# Altium PCB CH32H417QEU-R1.PcbDoc (part 1 of 6)
Units mil, origin at the board's own origin, x right, y up, seen from the top; angles counter-clockwise.
Board outline 4921.26 x 3346.46 mil, 4 copper layers (Top Layer, Layer 1, Layer 2, Bottom Layer), stack 23.756 mil thick; 271 components, 257 nets, 1065 pads, 927 vias.
Unrouted connection lines stored in the file: 149.
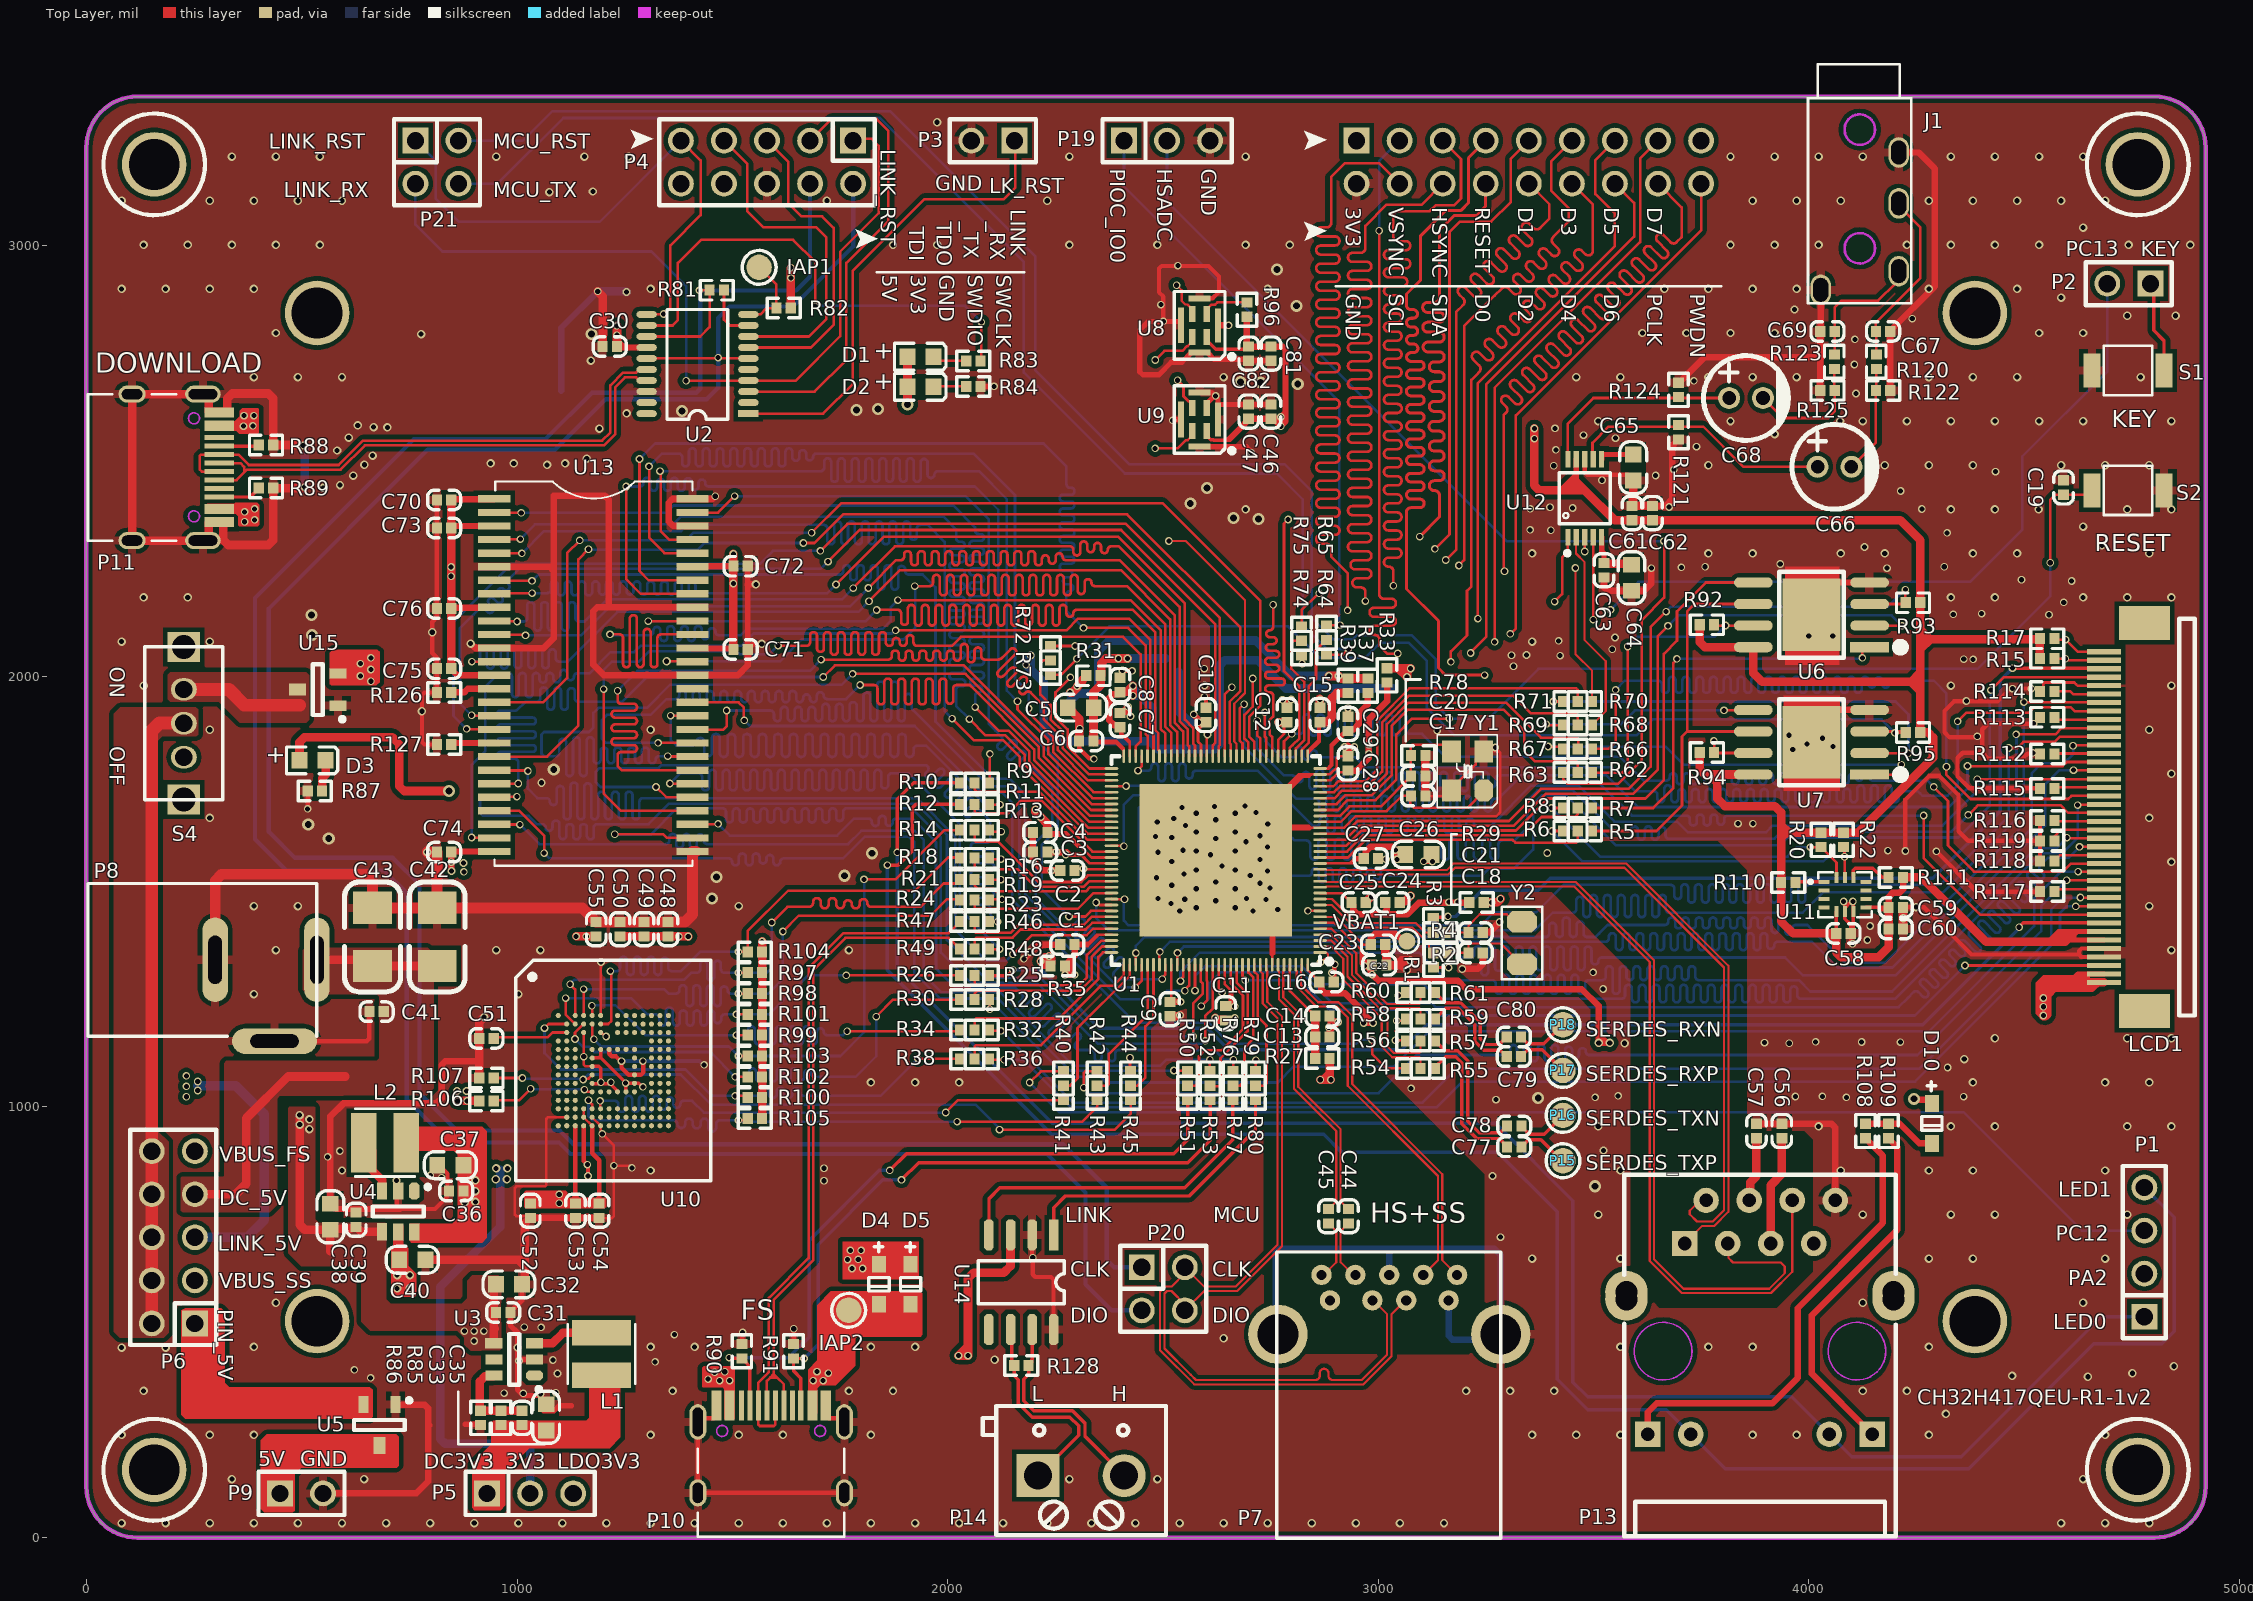
[diagram p0: Top Layer view]
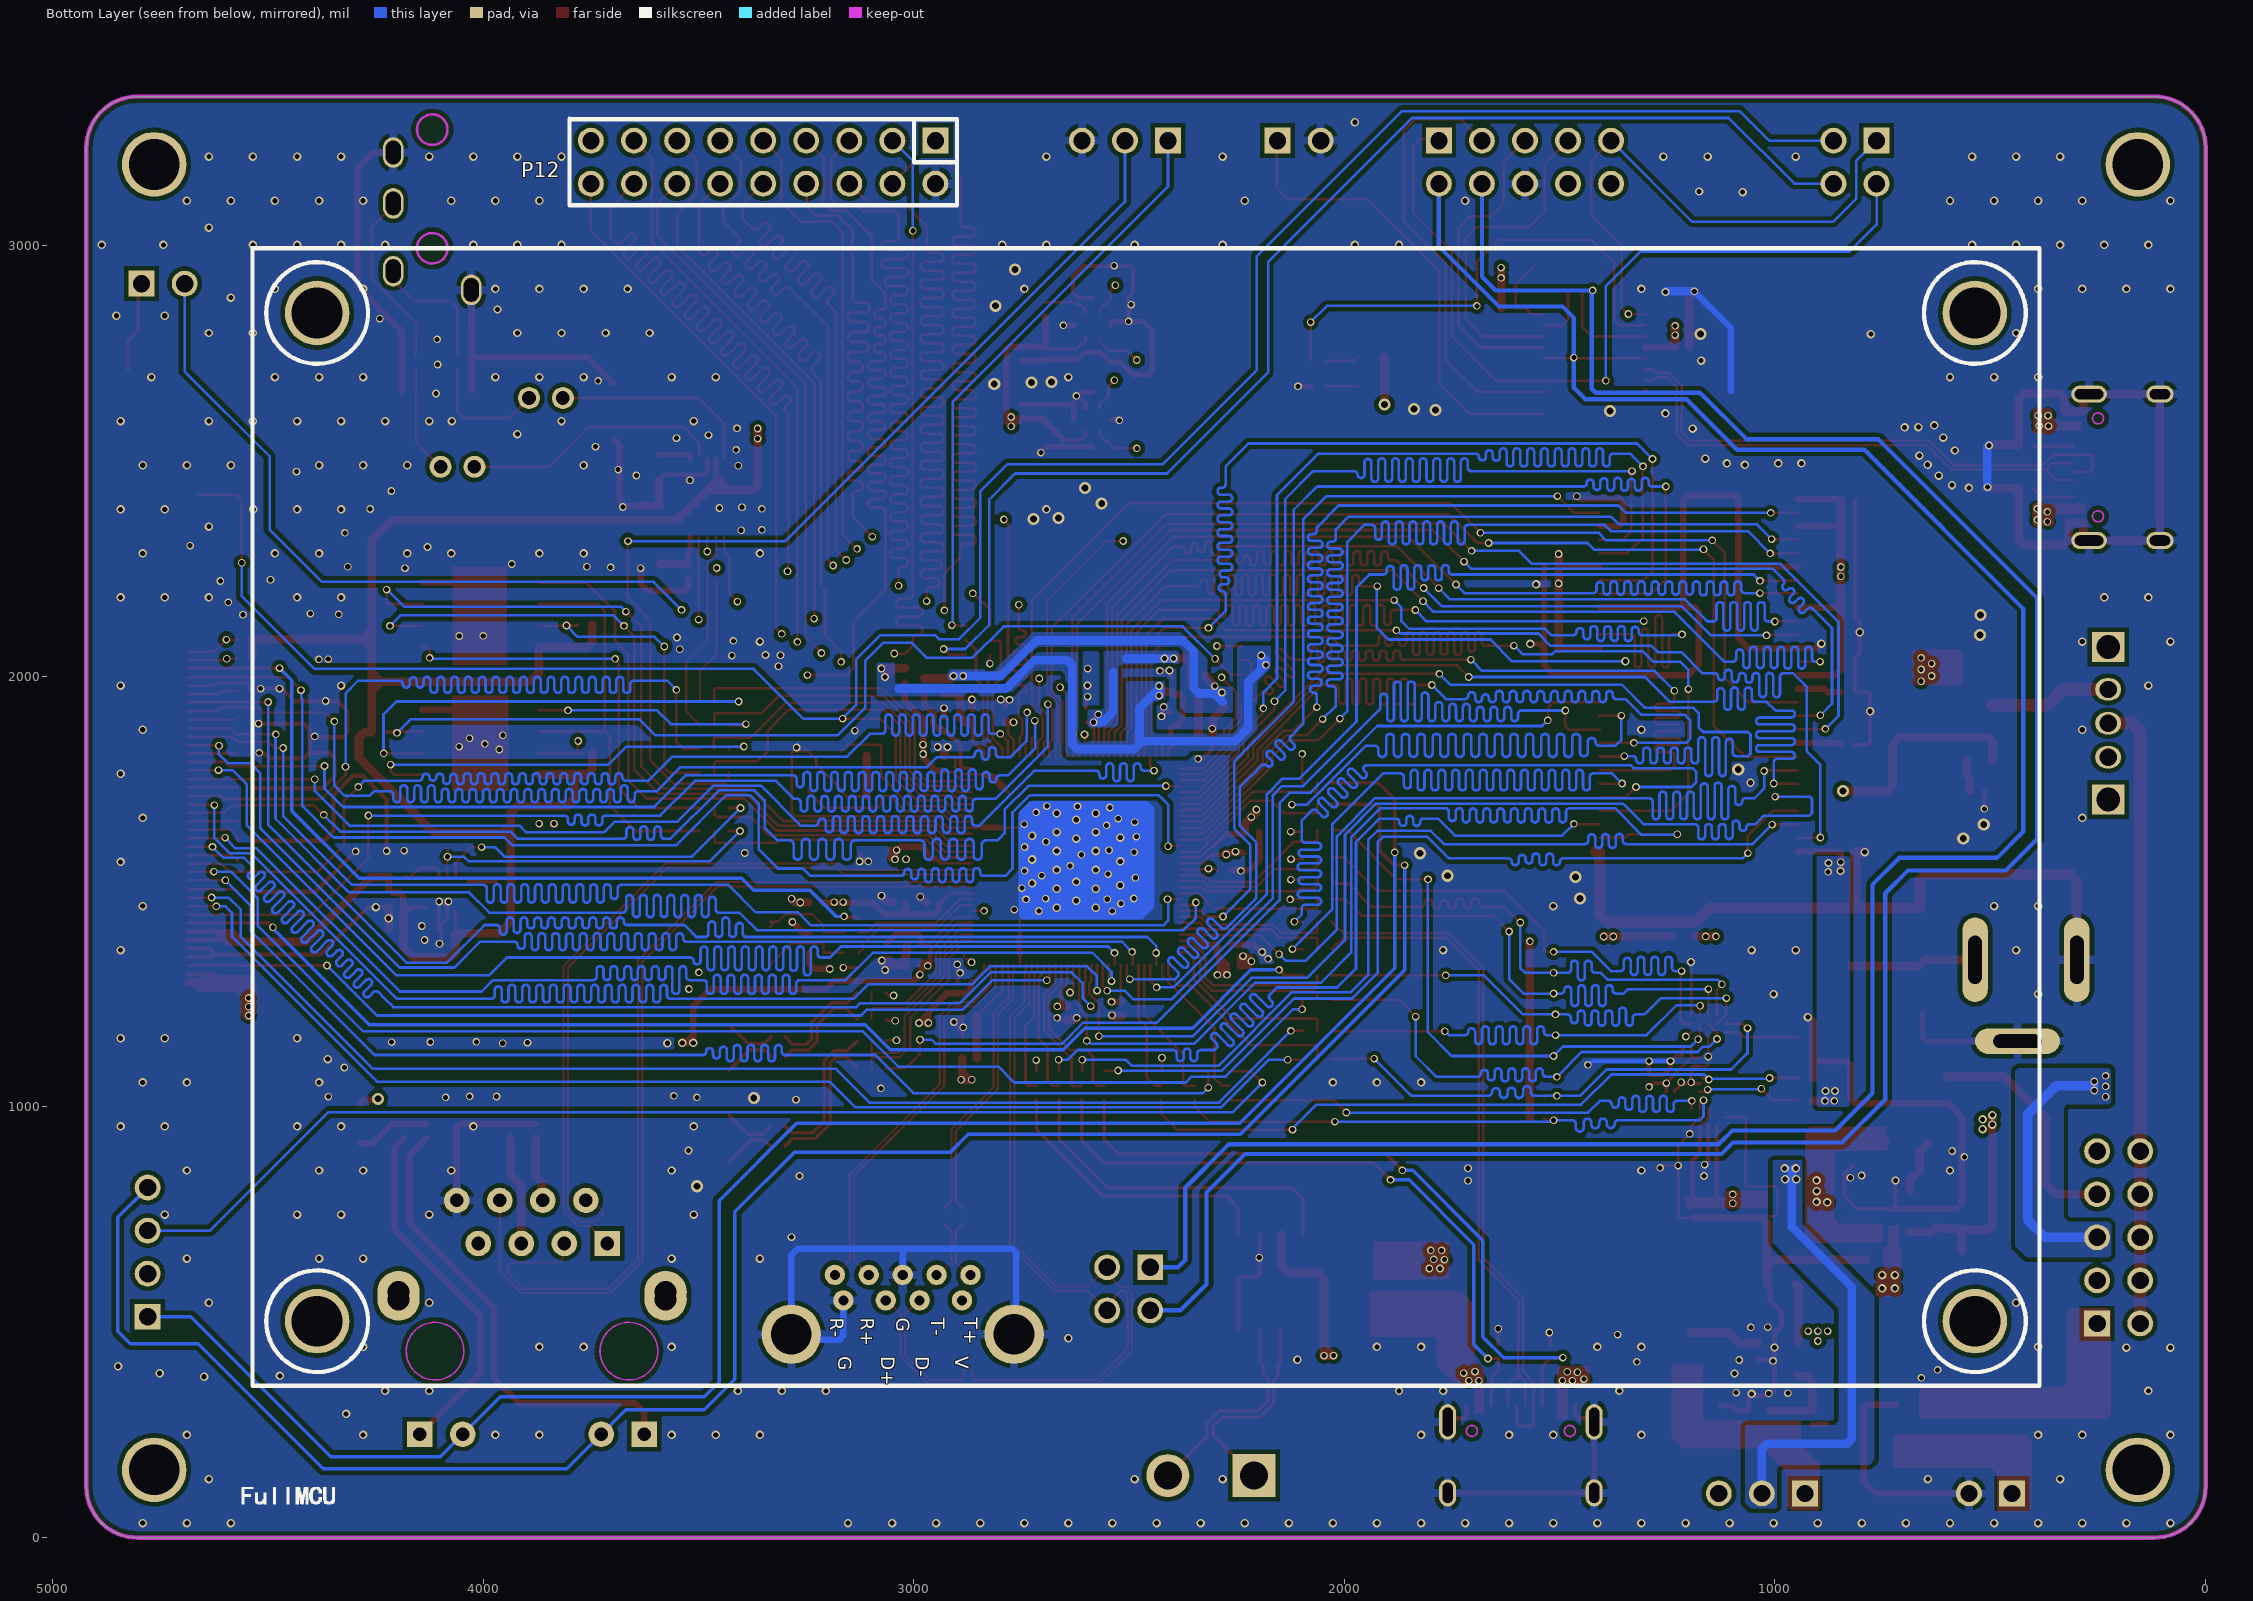
[diagram p1: Bottom Layer view, seen from below]
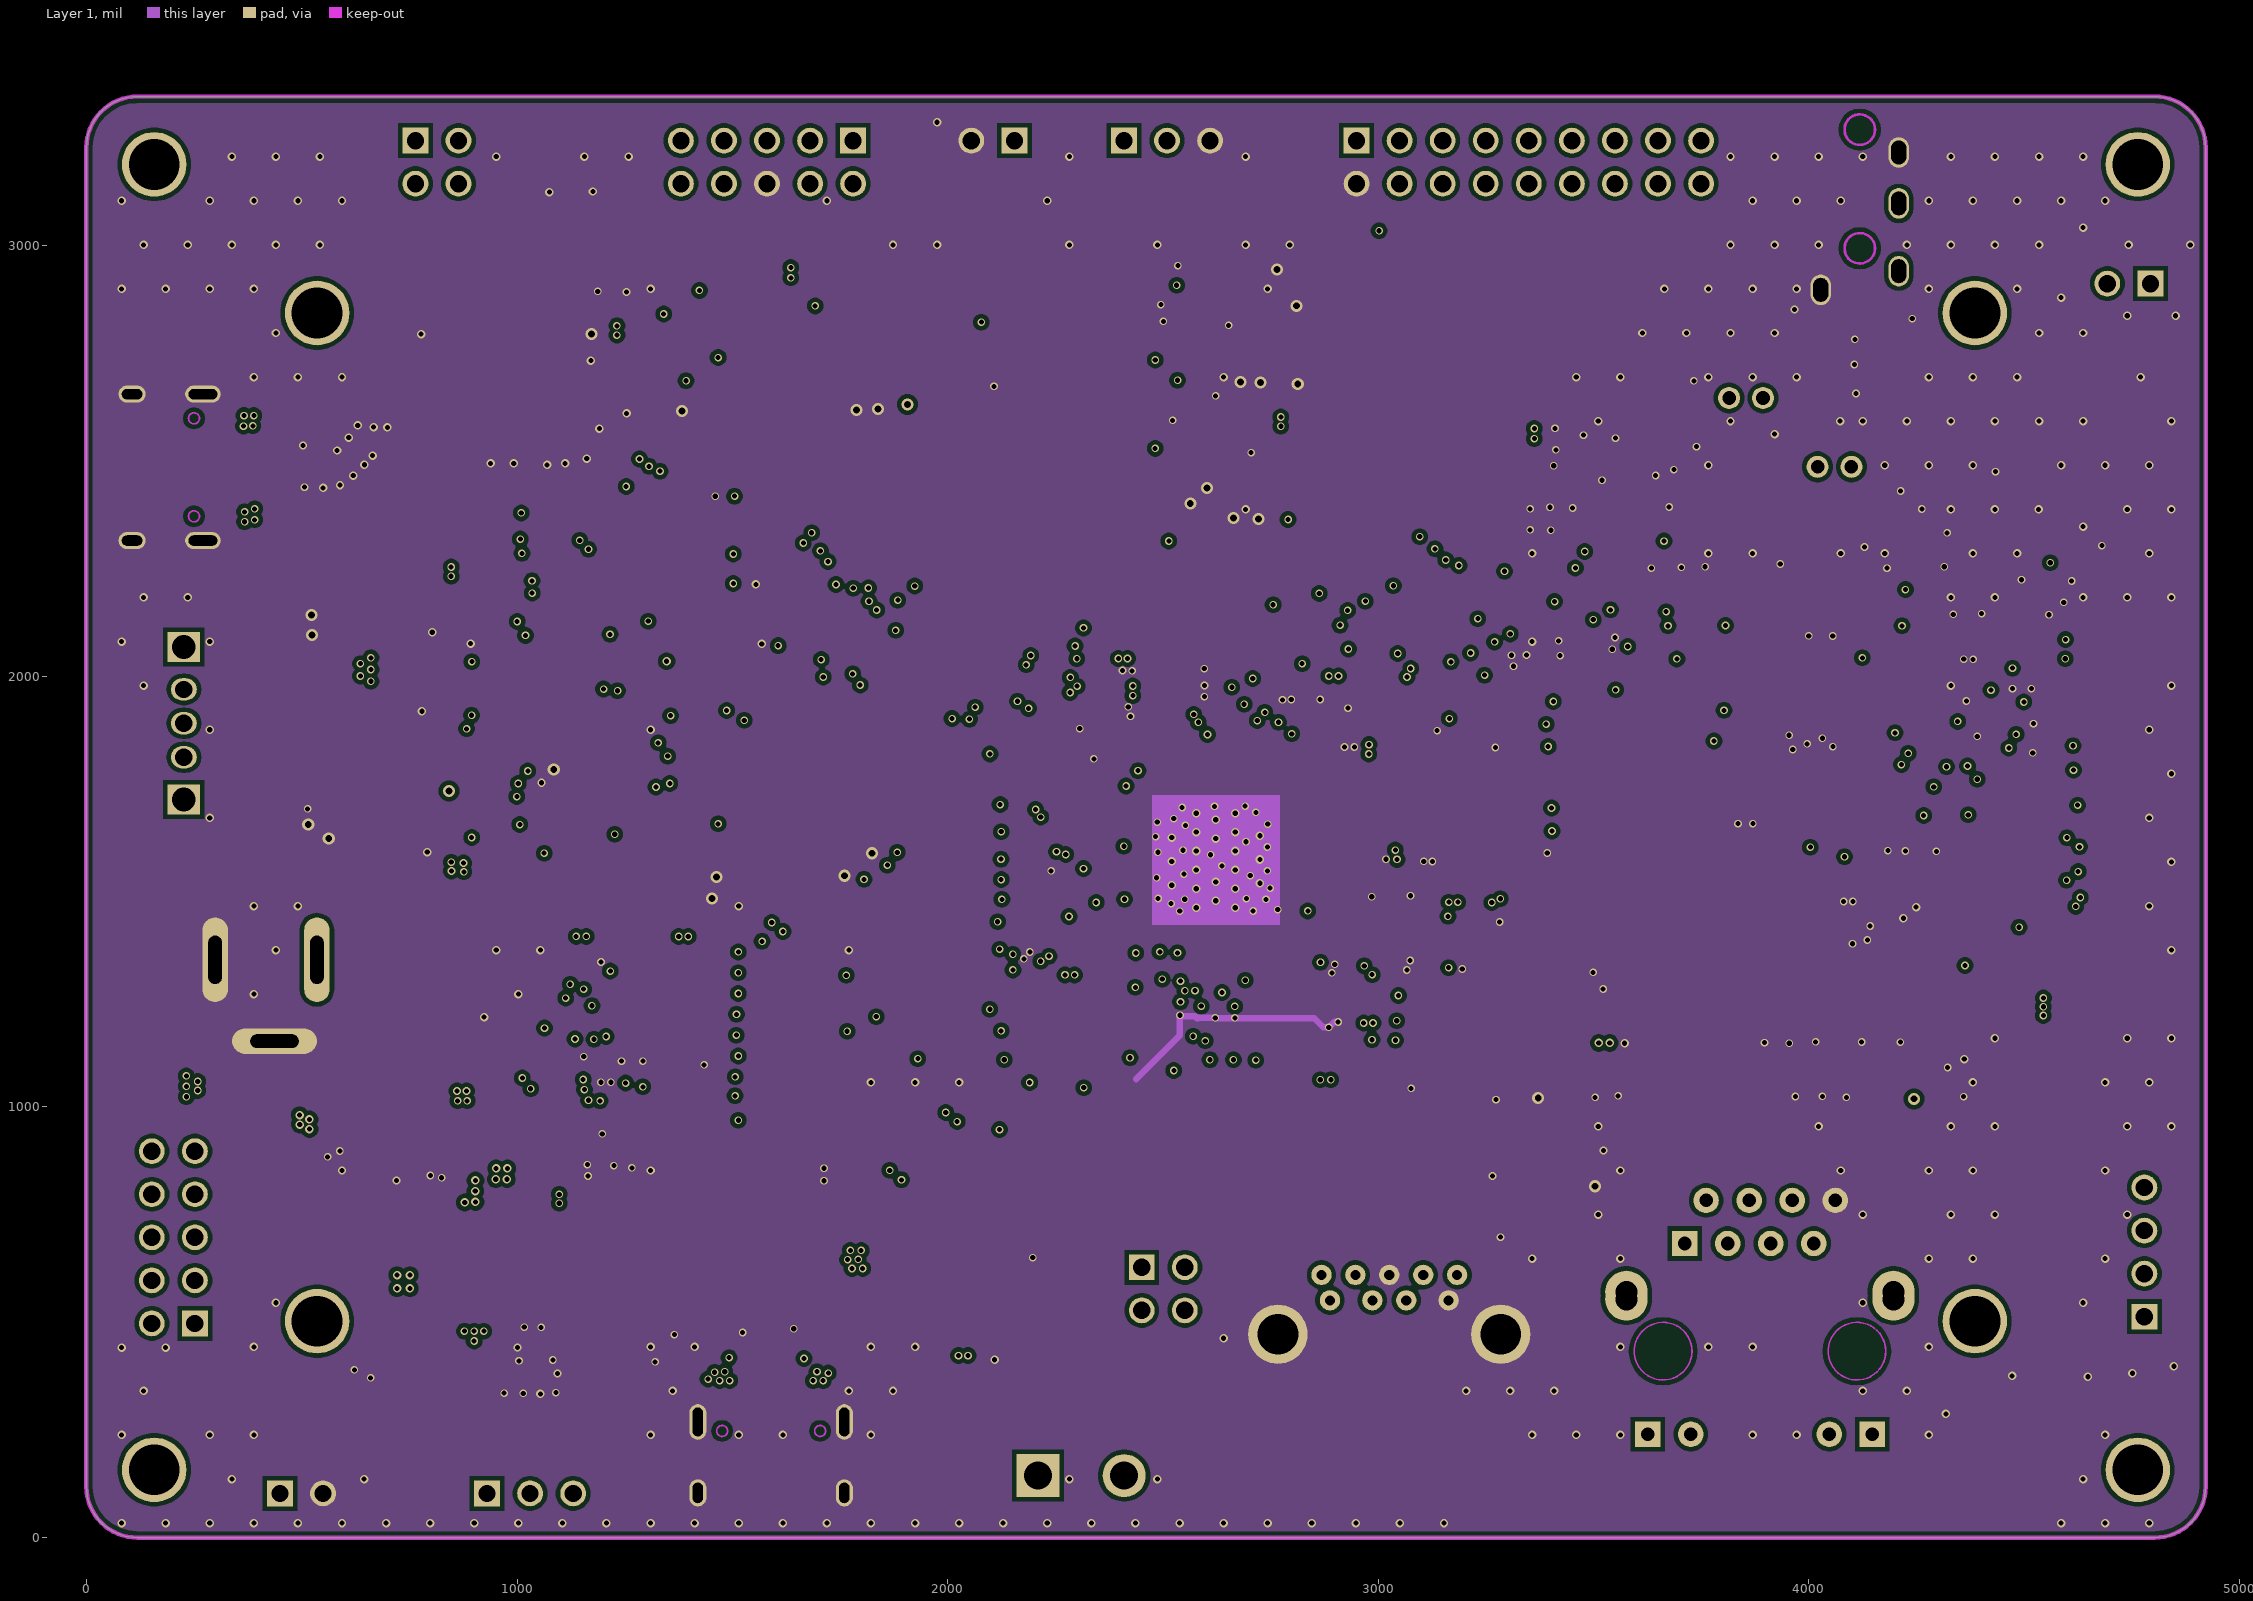
[diagram p2: Layer 1]
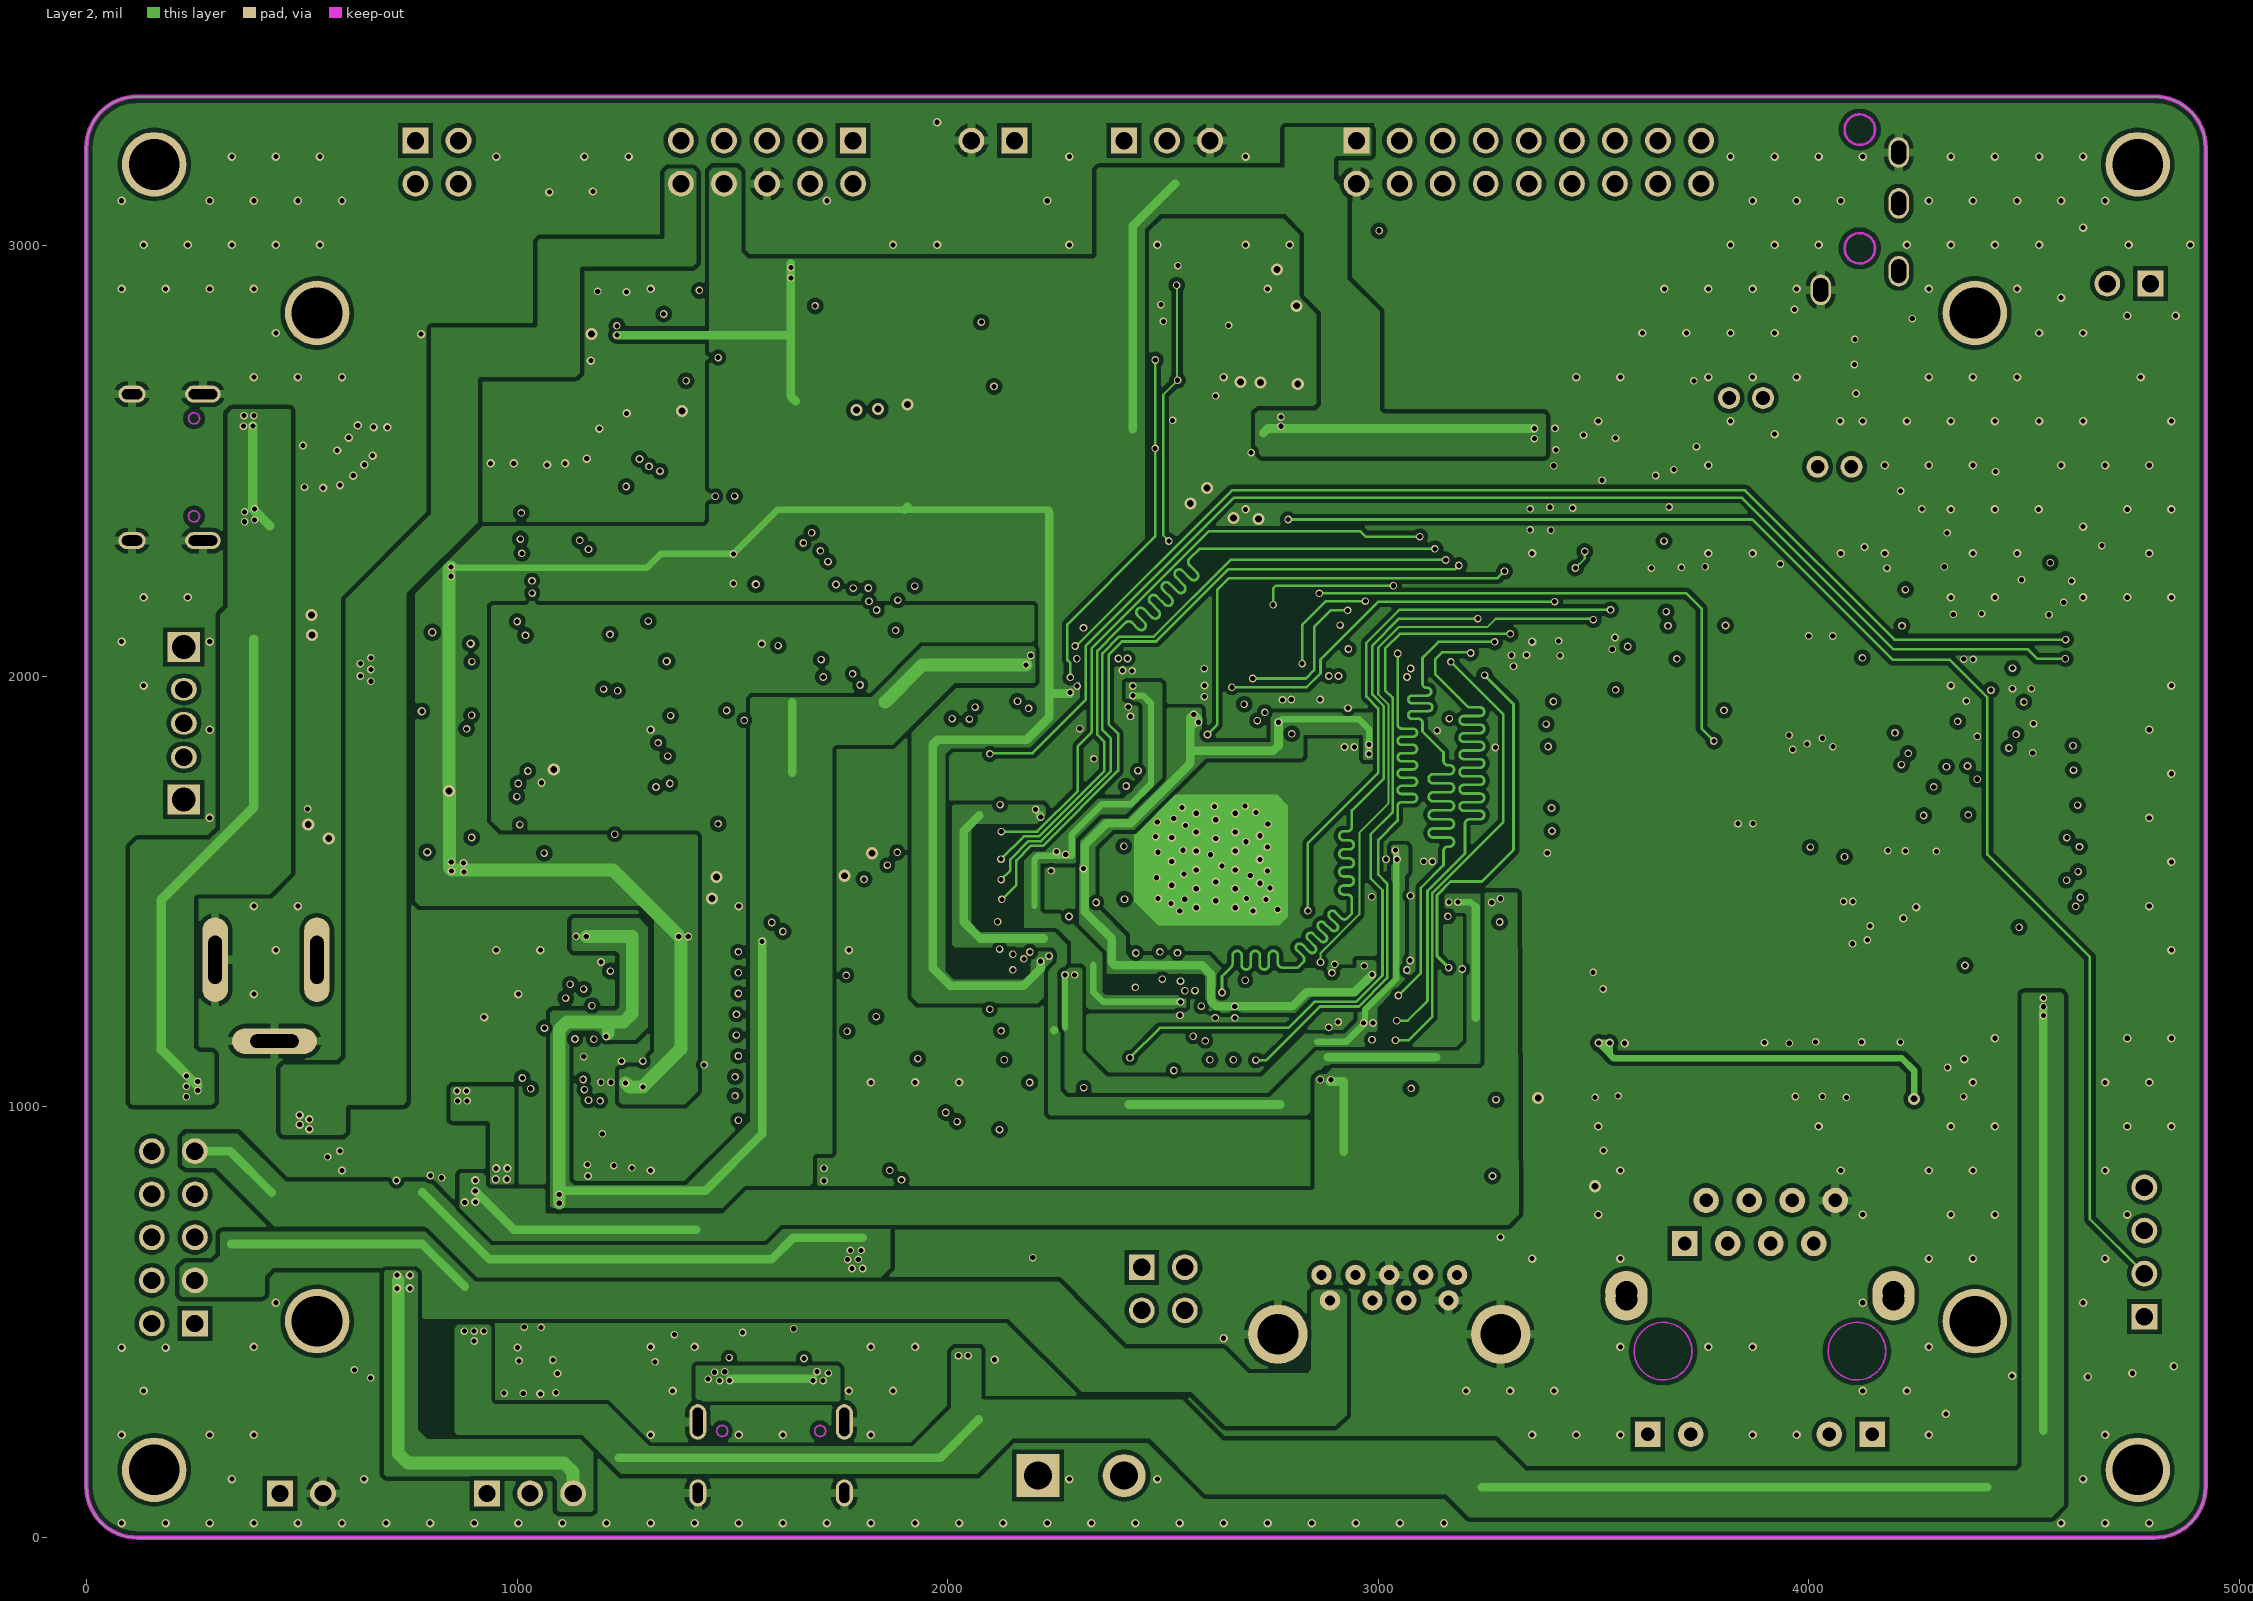
[diagram p3: Layer 2]

## Layer stack, top to bottom
Top Solder: solder mask 0.4, Solder Resist, Dk 3.5
Top Layer: signal copper 1.4
Dielectric 2: prepreg 2.8, PP-006, Dk 4.1
Layer 1: signal copper 1.378
Dielectric 1: dielectric 12.6, FR-4, Dk 4.8
Layer 2: signal copper 1.378
Dielectric 3: prepreg 2.8, PP-006, Dk 4.1
Bottom Layer: signal copper 1.4
Bottom Solder: solder mask 0.4, Solder Resist, Dk 3.5

## Board outline
118.11,0 cw(c118.11,118.11) 0,118.11 0,3228.35 cw(c118.11,3228.35) 118.11,3346.46 4803.15,3346.46 cw(c4803.15,3228.35) 4921.26,3228.35 4921.26,118.11 cw(c4803.15,118.11) 4803.15,0

## Design rules (kind name [scope] priority, off if disabled: settings)
Clearance Clearance_1 [InPolygon] p1: gap=10 ignorepadtopadclearanceinfootprint=FALSE
Clearance [All] p2: gap=5 ignorepadtopadclearanceinfootprint=FALSE except(6: Arc-THPad Arc-Via Track-THPad Track-Via Via-Fill Via-Poly Via-Region)
ComponentClearance [All] p1 off: gap=10 collisioncheckmode=3 verticalgap=10 showdistances=FALSE
DiffPairsRouting [All] p1: maxlimit=10 minlimit=5 mostfreqgap=8 toplayer_minwidth=4 toplayer_maxwidth=15 toplayer_prefwidth=8 midlayer1_minwidth=4 midlayer1_maxwidth=15 midlayer1_prefwidth=8 midlayer2_minwidth=4 midlayer2_maxwidth=15 midlayer2_prefwidth=8 bottomlayer_minwidth=4 bottomlayer_maxwidth=15 bottomlayer_prefwidth=8 maxuncoupledlength=500
HoleToHoleClearance [All] p1: gap=8 allowstackedmicrovias=TRUE
MinimumAnnularRing [All] p1: minimumring=2.76
MinimumSolderMaskSliver [All] p1 off: minsoldermaskwidth=10
PlaneConnect [All] p1: planeconnectstyle=Direct reliefexpansion=20 reliefentries=4 reliefconductorwidth=10 reliefairgap=10
PolygonConnect PolygonConnect_2 [InPolygonClass('New Class')] p1: connectstyle=Direct reliefconductorwidth=10 reliefentries=4 polygonreliefangle="90 Angle" airgapwidth=10
PolygonConnect PolygonConnect_1 [IsVia] p2: connectstyle=Direct reliefconductorwidth=10 reliefentries=4 polygonreliefangle="90 Angle" airgapwidth=10
PolygonConnect [All] p3: connectstyle=Relief reliefconductorwidth=20 reliefentries=4 polygonreliefangle="90 Angle" airgapwidth=10
RoutingVias [All] p1: holewidth=7.87 width=17.72 viastyle="Through Hole" minholewidth=5.91 minwidth=11.81 maxholewidth=28 maxwidth=50
SilkToSilkClearance [All] p1 off: silktosilkclearance=10
SilkToSolderMaskClearance [IsPad] p1 off: minsilkscreentomaskgap=10 clearancetoexposedcopper=TRUE
SolderMaskExpansion [All] p1: expansion=2 istentingtop=FALSE
Width [All] p1: maxlimit=100 minlimit=4 preferedwidth=5
23 further rules are at their usual default settings.

## Classes and differential pairs
polygon class "New Class": 1V2 3V3 5V DC_5V GND LDO_3V3 Link_5V NetF1_2 NetP6_2 VBUS_5V VBUS_CC VBUS_FS VDD33 VDDIO VDDK VIO_1.8
component class U_MCU: C1 C2 C3 C4 C5 C6 C7 C8 C9 C10 C11 C12 C13 C14 C15 C16 C17 C18 C19 C20 C21 C22 C23 C24 C25 C26 C27 C28 C29 P1 P2 R1 R2 R3 R4 R5 R6 R7 R8 R9 R10 R11 R12 R13 R14 R15 R16 R17 R18 R19 R20 R21 R22 R23 R24 R25 R26 R27 R28 R29 R30 R31 R32 R33 R34 R35 R36 R37 R38 R39 R40 R41 R42 R43 R44 R45 R46 R47 R48 R49 R50 R51 R52 R53 R54 R55 R56 R57 R58 R59 R60 R61 R62 R63 R64 R65 R66 R67 R68 R69 R70 R71 R72 R73 R74 R75 R76 R77 R78 R79 R80 S1 S2 U1 VBAT1 Y1 Y2
component class SDRAM: C70 C71 C72 C73 C74 C75 C76 R126 R127 U13
component class SAI: C61 C62 C63 C64 C65 C66 C67 C68 C69 J1 R120 R121 R122 R123 R124 R125 U12
component class QSPI: R92 R93 R94 R95 U6 U7
component class POWER: C31 C32 C33 C35 C36 C37 C38 C39 C40 C41 C42 C43 C44 C45 D3 D4 D5 IAP2 L1 L2 P5 P6 P7 P8 P9 P10 P11 R85 R86 R87 R88 R89 R90 R91 S4 U3 U4 U5 U15
component class Link: C30 D1 D2 IAP1 P3 P4 P20 P21 R81 R82 R83 R84 U2
component class LCD: LCD1 R112 R113 R114 R115 R116 R117 R118 R119
component class I3C: C58 C59 C60 R110 R111 U11
component class GPIO_OUT: C77 C78 C79 C80 P15 P16 P17 P18 P19
component class ETH: C56 C57 D10 P13 R108 R109
component class eMMC: C48 C49 C50 C51 C52 C53 C54 C55 R97 R98 R99 R100 R101 R102 R103 R104 R105 R106 R107 U10
component class DVP: P12
component class DFSDM: C46 C47 C81 C82 R96 U8 U9
component class CAN: P14 R128 U14
differential pair OTG_FS_D: +OTG_FS_DM -OTG_FS_DP
differential pair USB: +USB_P -USB_N
differential pair MDIT: +MDITN -MDITP
differential pair MDIR: +MDIRP -MDIRN
differential pair NewDifferentialPair1: +DIO -CLK
differential pair USBSS_RX: +USBSS_RXN -USBSS_RXP
differential pair USBSS_TX: +USBSS_TXP -USBSS_TXN
differential pair NetC45_NetC44: +NetC45_1 -NetC44_1

## Components (designator, comment, footprint, x,y, rotation, side; value= is the part's Value field where it differs from the comment)
C1 "0.1uF" 0402_C 2294.81,1377.05 r270 top
C2 "0.1uF" 0402_C 2294.81,1549.28 r270 top
C3 "0.1uF" 0402_C 2231.57,1591.87 r270 top
C4 "0.1uF" 0402_C 2231.57,1637.93 r270 top
C5 "10uF" 0603_C 2278.83,1927.43 r0 top
C6 "0.1uF" 0402_C 2338.75,1849.89 r270 top
C7 "0.1uF" 0402_C 2400.44,1881.77 r180 top
C8 "2.2uF" 0402_C 2400.44,1996.65 r0 top
C9 "0.1uF" 0402_C 2515.86,1244.02 r0 top
C10 "0.1uF" 0402_C 2599.81,1893.55 r180 top
C11 "0.1uF" 0402_C 2645.81,1200.82 r180 top
C12 "0.1uF" 0402_C 2787.93,1927.01 r0 top
C13 "2.2uF" 0402_C 2886.96,1162.17 r270 top
C14 "0.1uF" 0402_C 2886.96,1210.76 r270 top
C15 "0.1uF" 0402_C 2864.18,1927.01 r0 top
C16 "0.1uF" 0402_C 2896.43,1289.84 r270 top
C17 "18pF" 0402_C 3109.34,1721.83 r270 top
C18 "NC(12pF)" 0402_C 3209.37,1358.03 r90 top
C19 "0.1uF" 0402_C 4591.47,2455.37 r0 top
C20 "18pF" 0402_C 3109.34,1768.63 r270 top
C21 "NC(12pF)" 0402_C 3209.37,1405.33 r90 top
C22 "0.1uF" 0402_C 3019.07,1329.25 r270 top
C23 "0.1uF" 0402_C 3016.07,1376.84 r270 top
C24 "0.1uF" 0402_C 3049.76,1475.16 r270 top
C25 "2.2uF" 0402_C 2937.58,1475.16 r90 top
C26 "10uF" 0603_C 3123.49,1586.38 r180 top
C27 "0.1uF" 0402_C 2999.63,1577.37 r270 top
C28 "0.1uF" 0402_C 2929.59,1781.1 r180 top
C29 "0.1uF" 0402_C 2929.62,1906.29 r0 top
C30 "0.1uF" 0402_C 1232.24,2766.1 r270 top
C31 "1uF" 0402_C 984.52,523.05 r270 top
C32 "10uF" 0603_C 1011.68,588.05 r180 top
C33 "4.7pF" 0402_C 1012,261.16 r180 top
C35 "10uF" 0603_C 1067.6,309.68 r270 top
C36 "0.1uF" 0402_C 842.12,804.9 r90 top
C37 "10uF" 0603_C 814.95,864.9 r0 top
C38 "10uF" 0603_C 566.61,775.46 r270 top
C39 "0.1uF" 0402_C 626.61,754.83 r0 top
C40 "10uF" 0603_C 787.27,645.25 r180 top
C41 "NC(100nF)" 0402_C 657.06,1221.42 r90 top
C42 "NC(33uF)" 3528_C 814.56,1462.4 r90 top
C43 "NC(33uF)" 3528_C 664.56,1462.4 r90 top
C44 "0.1uF" 0402_C 2930.52,729.62 r180 top
C45 "0.1uF" 0402_C 2884.52,729.62 r180 top
C46 "NC(1uF)" 0402_C 2750.74,2631.64 r0 top
C47 "NC(100nF)" 0402_C 2699.2,2631.64 r0 top
C48 "NC(4.7uF)" 0402_C 1350.89,1429.75 r0 top
C49 "NC(4.7uF)" 0402_C 1295.22,1396.29 r180 top
C50 "NC(0.1uF)" 0402_C 1239.55,1396.29 r180 top
C51 "NC(0.1uF)" 0402_C 912.31,1159.44 r90 top
C52 "NC(4.7uF)" 0402_C 1030.78,742.38 r180 top
C53 "NC(0.1uF)" 0402_C 1135.78,775.85 r0 top
C54 "NC(0.1uF)" 0402_C 1190.78,775.85 r0 top
C55 "NC(0.1uF)" 0402_C 1183.89,1396.29 r180 top
C56 "0.1uF" 0402_C 3937.09,960.99 r0 top
C57 "0.1uF" 0402_C 3878.09,960.99 r0 top
C58 "NC(10nF)" 0402_C 4097.11,1403.22 r270 top
C59 "NC(100nF)" 0402_C 4218.65,1463.58 r270 top
C60 "NC(2.2uF)" 0402_C 4218.65,1413.58 r270 top
C61 "NC(1uF)" 0402_C 3589.22,2395.98 r0 top
C62 "NC(100nF)" 0402_C 3636.76,2395.98 r0 top
C63 "NC(100nF)" 0402_C 3523.86,2229.58 r180 top
C64 "NC(10uF)" 0603_C 3588.09,2198.76 r90 top
C65 "NC(10uF)" 0603_C 3592.2,2454.76 r90 top
C66 "NC(3.3uF)" CAP-TH_BD5.0-P2.00-D0.8-FD 4059.48,2486.69 r0 top
C67 "NC(2.7nF)" 0402_C 4188.95,2801.3 r270 top
C68 "NC(3.3uF)" CAP-TH_BD5.0-P2.00-D0.8-FD 3854.02,2646.43 r0 top
C69 "NC(2.7nF)" 0402_C 4026.46,2801.3 r90 top
C70 "NC(104)" 0402_C 813.93,2409.77 r90 top
C71 "NC(104)" 0402_C 1535.86,2062.77 r270 top
C72 "NC(104)" 0402_C 1535.86,2255.77 r270 top
C73 "NC(104)" 0402_C 813.93,2344.77 r90 top
C74 "NC(104)" 0402_C 813.93,1591.77 r90 top
C75 "NC(104)" 0402_C 813.93,2017.77 r90 top
C76 "NC(104)" 0402_C 813.93,2157.77 r90 top
C77 "NC(0.1uF)" 0402_C 3298.94,907.6 r90 top
C78 "NC(0.1uF)" 0402_C 3298.94,956.16 r90 top
C79 "NC(0.1uF)" 0402_C 3298.25,1116.81 r90 top
C80 "NC(0.1uF)" 0402_C 3298.25,1162.71 r90 top
C81 "NC(1uF)" 0402_C 2750.74,2732.86 r180 top
C82 "NC(100nF)" 0402_C 2699.2,2732.86 r180 top
D1 "BLUE" 0603+ 1906.72,2742.31 r0 top
D2 "RED" 0603+ 1906.72,2672.23 r0 top
D3 "RED" 0603+ 494.76,1804.93 r0 top
D4 "NC(Diode)" SOD-323 1840.64,634.85 r270 top
D5 "NC(Diode)" SOD-323 1914.22,634.85 r270 top
D10 "Diode" SOD-323 4285.54,1008.6 r270 top
IAP1 "Testpoint" TESTPOINT1 1562.16,2949.87 r0 top
IAP2 "VBUS_CC" TESTPOINT1 1770.14,527.9 r90 top
J1 "NC(Phone Jack)" 3.5MMEARPHONE 4027.56,2897.64 r0 top
L1 "2.2uH" CD32 1196.12,426.16 r270 top
L2 "2.2uH" CD32 693.13,917.27 r0 top
LCD1 "NC(LCD_FPCPIN)" FPC40P-0.5-FK750M3 4732.34,1673.23 r270 top
P1 "HEADER 4" SIP4-2.54mm 4779,513 r180 top
P2 "HEADER 2" SIP2-2.54mm 4793,2912 r90 top
P3 "NC(HEADER 2)" SIP2-2.54mm 2155,3244.09 r90 top
P4 "HEADER 5x2" IDC10-2.54mm 1380.53,3244.09 r270 top
P5 "HEADER 3" SIP3-2.54MM 930.43,102.71 r90 top
P6 "HEADER 5x2" IDC10-2.54mm 251.84,897.38 r180 top
P7 "USB3.0-A" USB3.0-A-Receptacle 2887.83,551 r0 top
P8 "NC(POWER_JACK）" DC-005 535.24,1341.89 r0 top
P9 "NC(Header 2)" SIP2-2.54mm 449.56,102.71 r270 top
P10 "USBFS" TYPE-C-Receptacle-2.0 1590.08,306.76 r0 top
P11 "TYPE-C" TYPE-C-Receptacle-2.0 308.88,2485.43 r270 top
P12 "NC(HEADER 9x2)" IDC18-2.54MM 2949.61,3244.09 r270 bottom
P13 "HR911105A" HR911105A 3711.34,682.99 r0 top
P14 "NC" PORT2-5.08MM 2210,144 r90 top
P15 "SERDES_TXP" TESTPOINT1 3428.94,875.16 r0 top
P16 "SERDES_TXN" TESTPOINT1 3428.94,980.42 r0 top
P17 "SERDES_RXP" TESTPOINT1 3428.94,1084.84 r0 top
P18 "SERDES_RXN" TESTPOINT1 3428.94,1190.96 r0 top
P19 "NC(HEADER 3)" SIP3-2.54MM 2409.45,3244.09 r90 top
P20 "HEADER 2x2" IDC4-2.54MM 2450.8,627.78 r0 top
P21 "HEADER 2x2" IDC4-2.54MM 764.13,3244.09 r0 top
R1 "NC(0Ω)" 0402 3128.4,1324.57 r90 top
R2 "NC(0Ω)" 0402 3161.86,1358.03 r180 top
R3 "NC(0Ω)" 0402 3127.68,1438.79 r270 top
R4 "NC(0Ω)" 0402 3161.14,1405.33 r180 top
R5 "NC(0Ω)" 0402 3496.63,1640.86 r180 top
R6 "NC(0Ω)" 0402 3429.7,1640.86 r0 top
R7 "NC(0Ω)" 0402 3496.63,1694.28 r180 top
R8 "NC(0Ω)" 0402 3429.7,1694.28 r0 top
R9 "NC(0Ω)" 0402 2095.96,1752.71 r180 top
R10 "NC(0Ω)" 0402 2029.03,1752.71 r0 top
R11 "NC(0Ω)" 0402 2095.96,1702.71 r180 top
R12 "NC(0Ω)" 0402 2029.03,1702.71 r0 top
R13 "NC(0Ω)" 0402 2095.96,1642.71 r180 top
R14 "NC(0Ω)" 0402 2029.03,1642.71 r0 top
R15 "4.7K" 0402 4570,2042.01 r180 top
R16 "NC(0Ω)" 0402 2095.96,1577.71 r180 top
R17 "4.7K" 0402 4536.54,2087.43 r0 top
R18 "NC(0Ω)" 0402 2029.03,1577.71 r0 top
R19 "NC(0Ω)" 0402 2095.96,1528.7 r180 top
R20 "NC(4.7K)" 0402 4028.22,1603.47 r90 top
R21 "NC(0Ω)" 0402 2029.03,1528.7 r0 top
R22 "NC(4.7K)" 0402 4080.25,1636.93 r270 top
R23 "NC(0Ω)" 0402 2095.96,1481.08 r180 top
R24 "NC(0Ω)" 0402 2029.03,1481.08 r0 top
R25 "NC(0Ω)" 0402 2095.96,1305.04 r180 top
R26 "NC(0Ω)" 0402 2029.03,1305.04 r0 top
R27 "0Ω" 0402 2853.5,1113.02 r0 top
R28 "NC(0Ω)" 0402 2095.96,1249.4 r180 top
R29 "0Ω" 0402 3211.48,1475.16 r0 top
R30 "NC(0Ω)" 0402 2029.03,1249.4 r0 top
R31 "0Ω" 0402 2355.33,2001.48 r180 top
R32 "NC(0Ω)" 0402 2095.96,1178.41 r180 top
R33 "NC(0Ω)" 0402 3020.39,2018.93 r270 top
R34 "NC(0Ω)" 0402 2029.03,1178.41 r0 top
R35 "0Ω" 0402 2272.57,1327.8 r180 top
R36 "NC(0Ω)" 0402 2095.96,1111.04 r180 top
R37 "0Ω" 0402 2975.66,1961.5 r90 top
R38 "NC(0Ω)" 0402 2029.03,1111.04 r0 top
R39 "0Ω" 0402 2929.62,1961.5 r90 top
R40 "NC(0Ω)" 0402 2268.97,1082.95 r270 top
R41 "NC(0Ω)" 0402 2268.97,1016.02 r90 top
R42 "NC(0Ω)" 0402 2346.96,1082.95 r270 top
R43 "NC(0Ω)" 0402 2346.96,1016.02 r90 top
R44 "NC(0Ω)" 0402 2424.94,1082.95 r270 top
R45 "NC(0Ω)" 0402 2424.94,1016.02 r90 top
R46 "NC(0Ω)" 0402 2095.96,1430.46 r180 top
R47 "NC(0Ω)" 0402 2029.03,1430.46 r0 top
R48 "NC(0Ω)" 0402 2095.96,1366.35 r180 top
R49 "NC(0Ω)" 0402 2029.03,1366.35 r0 top
R50 "NC(0Ω)" 0402 2557.2,1082.95 r270 top
R51 "NC(0Ω)" 0402 2557.2,1016.02 r90 top
R52 "NC(0Ω)" 0402 2609.77,1082.95 r270 top
R53 "NC(0Ω)" 0402 2609.77,1016.02 r90 top
R54 "NC(0Ω)" 0402 3064.72,1089.51 r0 top
R55 "NC(0Ω)" 0402 3131.65,1089.51 r180 top
R56 "NC(0Ω)" 0402 3064.72,1152.84 r0 top
R57 "NC(0Ω)" 0402 3131.65,1152.84 r180 top
R58 "NC(0Ω)" 0402 3064.72,1203.86 r0 top
R59 "NC(0Ω)" 0402 3131.65,1203.86 r180 top
R60 "NC(0Ω)" 0402 3064.72,1265.63 r0 top
R61 "NC(0Ω)" 0402 3131.65,1265.63 r180 top
R62 "NC(0Ω)" 0402 3496.63,1776.64 r180 top
R63 "NC(0Ω)" 0402 3429.7,1776.64 r0 top
R64 "NC(0Ω)" 0402 2879.81,2050.82 r90 top
R65 "NC(0Ω)" 0402 2879.81,2117.75 r270 top
R66 "NC(0Ω)" 0402 3496.63,1831.64 r180 top
R67 "NC(0Ω)" 0402 3429.7,1831.64 r0 top
R68 "NC(0Ω)" 0402 3496.63,1886.64 r180 top
R69 "NC(0Ω)" 0402 3429.7,1886.64 r0 top
R70 "NC(0Ω)" 0402 3496.63,1941.64 r180 top
R71 "NC(0Ω)" 0402 3429.7,1941.64 r0 top
R72 "NC(0Ω)" 0402 2238.71,2070.67 r270 top
R73 "NC(0Ω)" 0402 2238.71,2003.74 r90 top
R74 "NC(0Ω)" 0402 2822.18,2049.09 r90 top
R75 "NC(0Ω)" 0402 2822.18,2116.01 r270 top
R76 "NC(0Ω)" 0402 2662.33,1082.95 r270 top
R77 "NC(0Ω)" 0402 2662.33,1016.02 r90 top
R78 "100K(NC)" 0402 3109.34,1816.07 r180 top
R79 "NC(0Ω)" 0402 2714.9,1082.95 r270 top
R80 "NC(0Ω)" 0402 2714.9,1016.02 r90 top
R81 "1K" 0402 1447.13,2896.76 r0 top
R82 "10K" 0402 1602.33,2855.06 r0 top
R83 "1K" 0402 2076.52,2732.6 r180 top
R84 "1K" 0402 2076.52,2673.36 r180 top
R85 "100k" 0402 962.88,261.16 r90 top
R86 "2.2k" 0402 914.9,294.63 r270 top
R87 "1K" 0402 547.34,1734.09 r180 top
R88 "NC(5.1K)" 0402 400.33,2537.19 r0 top
R89 "NC(5.1K)" 0402 400.33,2437.19 r0 top
R90 "NC(5.1K)" 0402 1522,416 r90 top
R91 "NC(5.1K)" 0402 1642,416 r90 top
R92 "NC(10K)" 0402 3746.53,2119.88 r0 top
R93 "NC(10K)" 0402 4225,2171 r0 top
R94 "NC(10K)" 0402 3746.53,1823 r0 top
R95 "NC(10K)" 0402 4225,1870 r0 top
R96 "NC(10K)" 0402 2695,2868.46 r270 top
R97 "NC(10K)" 0402 1535.64,1311.8 r0 top
R98 "NC(10K)" 0402 1535.64,1263.44 r0 top
R99 "NC(10K)" 0402 1535.64,1166.71 r0 top
R100 "NC(10K)" 0402 1535.64,1021.62 r0 top
R101 "NC(10K)" 0402 1535.64,1215.07 r0 top
R102 "NC(10K)" 0402 1535.64,1069.99 r0 top
R103 "NC(10K)" 0402 1535.64,1118.35 r0 top
R104 "NC(10K)" 0402 1535.64,1360.16 r0 top
R105 "NC(10K)" 0402 1535.64,973.26 r0 top
R106 "NC(10K)" 0402 945.77,1014.23 r180 top
R107 "NC(10K)" 0402 945.77,1067.38 r180 top
R108 "1K" 0402 4131.44,960.99 r270 top
R109 "1K" 0402 4184.59,960.99 r270 top
R110 "NC(10K)" 0402 3935.5,1521.06 r0 top
R111 "NC(10K)" 0402 4218.65,1533.22 r180 top
R112 "NC(10K)" 0402 4570,1820 r180 top
R113 "NC(10K)" 0402 4570,1905 r180 top
R114 "NC(10K)" 0402 4570,1965 r180 top
R115 "NC(10K)" 0402 4570,1740 r180 top
R116 "NC(10K)" 0402 4570,1665 r180 top
R117 "NC(10K)" 0402 4570,1500 r180 top
R118 "NC(10K)" 0402 4570,1571 r180 top
R119 "NC(10K)" 0402 4570,1618 r180 top
R120 "NC(470Ω)" 0402 4156.47,2713.9 r90 top
R121 "NC(270K)" 0402 3697.38,2583.44 r270 top
R122 "NC(10K)" 0402 4155.49,2663.42 r0 top
R123 "NC(470Ω)" 0402 4058.94,2713.9 r90 top
R124 "NC(270K)" 0402 3697.38,2648.48 r90 top
R125 "NC(10K)" 0402 4059.92,2663.42 r180 top
R126 "NC(10K)" 0402 813.93,1962.77 r0 top
R127 "NC(10K)" 0402 847.4,1841.77 r180 top
R128 "NC(240)" 0402 2188,400 r180 top
S1 "KEY" 贴片按键 4824.67,2710.37 r180 top
S2 "RESET" 贴片按键 4657.67,2431.76 r0 top
S4 "SW-SPDT" SW1 226.26,1891.04 r270 top
U1 "CH32H417QEU6" QFN128_12.3X12.3 2622.69,1572.51 r90 top
U2 "CH32V305F" TSSOP20 1537.04,2610.17 r90 top
U3 "CH2003K" SOT-23-6 1040.61,376.36 r90 top
U4 "CH2003V" SOT-23-6 761.41,804.46 r180 top
U5 "CH213" SOT-23-3 717.94,308.71 r180 top
U6 "NC(QSPI_FLASH)" SOIC-8_208MIL 4006,2143 r90 top
U7 "NC(QSPI_FLASH)" SOIC-8_208MIL 4006,1847 r90 top
U8 "NC(MP34DT06JTR)" MIC-MP34DT06J-L3.0-W4.0-P0.85-1.35-BL 2585,2815 r0 top
U9 "NC(MP34DT06JTR)" MIC-MP34DT06J-L3.0-W4.0-P0.85-1.35-BL 2585,2596.57 r0 top
U10 "NC(eMMC card)" WFBGA-153-11.5x13x0.8mm 1095.78,1212.38 r0 top
U11 "NC(ICM-42688-P)" LGA-14_L3.0-W2.5-P0.50-TL 4083.77,1493.06 r0 top
U12 "NC(4344-DAC)" TSSOP-10_L3.0-W3.0-P0.50-LS4.9-BL 3479.5,2413.67 r90 top
U13 "NC(SDRAM)" TSOP-54 947.4,2412.21 r90 top
U14 "NC(TJA1050)" SOP8 2246,703 r180 top
U15 "CH213" SOT-23-3 584.45,1931.93 r90 top
VBAT1 "Testpoint" TESTPOINT2 3066.67,1385.08 r180 top
Y1 "25M" XT3225 3244.82,1735.3 r90 top
Y2 "NC(32.768k)" FC-135 3333.77,1331.6 r90 top
? "Comment" HOLE 4385.43,502.56 r180 bottom locked
? "Comment" HOLE 4385.43,2843.9 r180 bottom locked
? "Comment" HOLE 535.83,2843.9 r180 bottom locked
? "" HOLE 535.83,502.56 r180 bottom locked
? "Comment" HOLE 157.48,157.48 r0 top
? "Comment" HOLE 157.48,3188.98 r0 top
? "Comment" HOLE 4763.78,3188.98 r0 top
? "Comment" HOLE 4763.78,157.48 r0 top

## Footprints (in the part's own frame and the unit in brackets; to place one, negate y for a bottom-side part, rotate by r counter-clockwise, add the part's x,y. Pads: shape width x height; smd on the part's side, far side on the other; paste and mask are expansions set on the pad)
3.5MMEARPHONE [mm]
  oval 1.2x1.8 hole 0.9 slot 1.4 at 90 deg: 1(0,0) 2(4.6,1.1) 3(4.6,5.1) 4(4.6,8.1)
  Keep-Out Layer circle w0.152: c2.3,9.45 r0.9
  Keep-Out Layer circle w0.152: c2.3,2.45 r0.9
  silkscreen extent -0.75,-0.8 5.35,13.3
0402 [mm]
  rect 0.6x0.65 smd mask+0.051: 1(0,0) 2(0.85,0)
  silkscreen extent -0.55,-0.58 1.4,0.57
0402_C [mm]
  rect 0.65x0.6 smd mask+0.051: 1(0,0) 2(0,-0.85)
  silkscreen extent -0.58,-1.4 0.57,0.55
0603+ [mm]
  rect 0.93x0.98 smd: 1(0,0) 2(1.54,0)
  silkscreen extent -0.76,-0.79 2.27,0.79
0603_C [mm]
  rect 0.93x0.98 smd mask+0.051: 1(0,0) 2(1.54,0)
  silkscreen extent -0.76,-0.79 2.31,0.79
3528_C [mil]
  rect 75x90 smd: 1(0,0) 2(-135,0)
  silkscreen extent -195,-65 60,65
CAP-TH_BD5.0-P2.00-D0.8-FD [mm]
  round 1.3 hole 0.8 paste+0 mask+0.051: 1(-1,0) 2(1,0)
  silkscreen extent -2.5,-2.5 2.5,2.5
CD32 [mm]
  rect 1.5x3.5 smd: 1(-1.25,0) 2(1.25,0)
  silkscreen extent -1.75,-2 1.75,2
DC-005 [mm]
  oval 1.5x5 hole 0.8 slot 2.85 at 90 deg: 1(0,0) 2(-6,0)
  oval 5x1.5 hole 0.8 slot 2.85 at 0 deg: 3(-2.5,-4.8)
  silkscreen extent -13.5,-4.5 0,4.5
FC-135 [mil]
  oct 50x70 smd: 1(0,0) 2(98.43,0)
  silkscreen extent -35,-47 133,47
FPC40P-0.5-FK750M3 [mm]
  rect 2x3 smd: 0(-11.436,1.202) 0(11.436,1.202)
  rect 0.3x2 smd: 1(9.75,-1.202) 2(9.25,-1.202) 3(8.75,-1.202) 4(8.25,-1.202) 5(7.75,-1.202) 6(7.25,-1.202) 7(6.75,-1.202) 8(6.25,-1.202) 9(5.75,-1.202) 10(5.25,-1.202) 11(4.75,-1.202) 12(4.25,-1.202) 13(3.75,-1.202) 14(3.25,-1.202) 15(2.75,-1.202) 16(2.25,-1.202) 17(1.75,-1.202) 18(1.25,-1.202) 19(0.75,-1.202) 20(0.25,-1.202) 21(-0.25,-1.202) 22(-0.75,-1.202) 23(-1.25,-1.202) 24(-1.75,-1.202) 25(-2.25,-1.202) 26(-2.75,-1.202) 27(-3.25,-1.202) 28(-3.75,-1.202) 29(-4.25,-1.202) 30(-4.75,-1.202) 31(-5.25,-1.202) 32(-5.75,-1.202) 33(-6.25,-1.202) 34(-6.75,-1.202) 35(-7.25,-1.202) 36(-7.75,-1.202) 37(-8.25,-1.202) 38(-8.75,-1.202) 39(-9.25,-1.202) 40(-9.75,-1.202)
  silkscreen extent -11.7,3.24 11.7,4.17, body extent -12.2,-1.75 12.2,4.55, height 2
HOLE [mm]
  round 3.81 hole 3: 0(0,0)
  silkscreen extent -3,-3 3,3
HR911105A [mm]
  rect 1.5x1.5 hole 0.8: 1(0,0) 9(-2.175,-11.252) 12(11.075,-11.252)
  round 1.5 hole 0.8: 2(1.27,2.54) 3(2.54,0) 4(3.81,2.54) 5(5.08,0) 6(6.35,2.54) 7(7.62,0) 8(8.89,2.54) 10(0.365,-11.252) 11(8.535,-11.252)
  round 2.5 hole 1.3: ""(-3.43,-2.852) ""(-3.43,-3.3) ""(12.32,-3.3) ""(12.32,-2.852)
  Keep-Out Layer circle w0.1: c-1.265,-6.352 r1.7
  Keep-Out Layer circle w0.1: c10.165,-6.352 r1.7
  silkscreen extent -3.55,-17.27 12.45,4.06
IDC4-2.54MM [mil]
  rect 60x60 hole 40: 1(0,0)
  round 60 hole 40: 2(100,0) 3(0,-100) 4(100,-100)
  silkscreen extent -50,-150 150,50
IDC10-2.54mm [mil]
  rect 60x60 hole 40: 1(0,400)
  round 60 hole 40: 2(100,400) 3(0,300) 4(100,300) 5(0,200) 6(100,200) 7(0,100) 8(100,100) 9(0,0) 10(100,0)
  silkscreen extent -50,-50 150,450
IDC18-2.54MM [mil]
  rect 60x60 hole 40: 1(0,0)
  round 60 hole 40: 2(100,0) 3(0,-100) 4(100,-100) 5(0,-200) 6(100,-200) 7(0,-300) 8(100,-300) 9(0,-400) 10(100,-400) 11(0,-500) 12(100,-500) 13(0,-600) 14(100,-600) 15(0,-700) 16(100,-700) 17(0,-800) 18(100,-800)
  silkscreen extent -51,-850 150,50
LGA-14_L3.0-W2.5-P0.50-TL [mm]
  rect 0.65x0.25 smd: 1(-1.25,0.75) 2(-1.25,0.25) 3(-1.25,-0.25) 4(-1.25,-0.75) 8(1.25,-0.75) 9(1.25,-0.25) 10(1.25,0.25) 11(1.25,0.75)
  rect 0.25x0.65 smd: 5(-0.5,-1) 6(0,-1) 7(0.5,-1) 12(0.5,1) 13(0,1) 14(-0.5,1)
  silkscreen extent -2.13,-1.33 1.58,1.33
MIC-MP34DT06J-L3.0-W4.0-P0.85-1.35-BL [mm]
  rect 0.4x0.95 smd mask+0.05: 1(0.425,-0.675) 2(0.425,0.675) 3(-0.425,0.675) 4(-0.425,-0.675)
  rect 0.35x2.1 smd mask+0: 5(-1.1,0)
  rect 1.3x0.35 smd mask+0: 5(0,-1.6) 5(0,1.6)
  rect 0.35x2 smd mask+0: 5(1.1,0)
  silkscreen extent -1.5,-2 2.03,2
PORT2-5.08MM [mil]
  rect 100x100 hole 65: 1(0,0)
  round 100 hole 65: 2(0,-200)
  silkscreen extent -138,-297 161,128
QFN128_12.3X12.3 [mm]
  rect 9x9 smd mask+0.051: 0(0,0)
  oval 0.16x0.8 smd mask+0.051: 1(-5.425,-6.15) 2(-5.075,-6.15) 3(-4.725,-6.15) 4(-4.375,-6.15) 5(-4.025,-6.15) 6(-3.675,-6.15) 7(-3.325,-6.15) 8(-2.975,-6.15) 9(-2.625,-6.15) 10(-2.275,-6.15) 11(-1.925,-6.15) 12(-1.575,-6.15) 13(-1.225,-6.15) 14(-0.875,-6.15) 15(-0.525,-6.15) 16(-0.175,-6.15) 17(0.175,-6.15) 18(0.525,-6.15) 19(0.875,-6.15) 20(1.225,-6.15) 21(1.575,-6.15) 22(1.925,-6.15) 23(2.275,-6.15) 24(2.625,-6.15) 25(2.975,-6.15) 26(3.325,-6.15) 27(3.675,-6.15) 28(4.025,-6.15) 29(4.375,-6.15) 30(4.725,-6.15) 31(5.075,-6.15) 32(5.425,-6.15) 65(5.425,6.15) 66(5.075,6.15) 67(4.725,6.15) 68(4.375,6.15) 69(4.025,6.15) 70(3.675,6.15) 71(3.325,6.15) 72(2.975,6.15) 73(2.625,6.15) 74(2.275,6.15) 75(1.925,6.15) 76(1.575,6.15) 77(1.225,6.15) 78(0.875,6.15) 79(0.525,6.15) 80(0.175,6.15) 81(-0.175,6.15) 82(-0.525,6.15) 83(-0.875,6.15) 84(-1.225,6.15) 85(-1.575,6.15) 86(-1.925,6.15) 87(-2.275,6.15) 88(-2.625,6.15) 89(-2.975,6.15) 90(-3.325,6.15) 91(-3.675,6.15) 92(-4.025,6.15) 93(-4.375,6.15) 94(-4.725,6.15) 95(-5.075,6.15) 96(-5.425,6.15)
  oval 0.8x0.16 smd mask+0.051: 33(6.15,-5.425) 34(6.15,-5.075) 35(6.15,-4.725) 36(6.15,-4.375) 37(6.15,-4.025) 38(6.15,-3.675) 39(6.15,-3.325) 40(6.15,-2.975) 41(6.15,-2.625) 42(6.15,-2.275) 43(6.15,-1.925) 44(6.15,-1.575) 45(6.15,-1.225) 46(6.15,-0.875) 47(6.15,-0.525) 48(6.15,-0.175) 49(6.15,0.175) 50(6.15,0.525) 51(6.15,0.875) 52(6.15,1.225) 53(6.15,1.575) 54(6.15,1.925) 55(6.15,2.275) 56(6.15,2.625) 57(6.15,2.975) 58(6.15,3.325) 59(6.15,3.675) 60(6.15,4.025) 61(6.15,4.375) 62(6.15,4.725) 63(6.15,5.075) 64(6.15,5.425) 97(-6.15,5.425) 98(-6.15,5.075) 99(-6.15,4.725) 100(-6.15,4.375) 101(-6.15,4.025) 102(-6.15,3.675) 103(-6.15,3.325) 104(-6.15,2.975) 105(-6.15,2.625) 106(-6.15,2.275) 107(-6.15,1.925) 108(-6.15,1.575) 109(-6.15,1.225) 110(-6.15,0.875) 111(-6.15,0.525) 112(-6.15,0.175) 113(-6.15,-0.175) 114(-6.15,-0.525) 115(-6.15,-0.875) 116(-6.15,-1.225) 117(-6.15,-1.575) 118(-6.15,-1.925) 119(-6.15,-2.275) 120(-6.15,-2.625) 121(-6.15,-2.975) 122(-6.15,-3.325) 123(-6.15,-3.675) 124(-6.15,-4.025) 125(-6.15,-4.375) 126(-6.15,-4.725) 127(-6.15,-5.075) 128(-6.15,-5.425)
  silkscreen extent -6.15,-6.84 6.15,6.15
SIP2-2.54mm [mil]
  rect 60x60 hole 40: 1(0,0)
  round 60 hole 40: 2(0,100)
  silkscreen extent -50,-50 50,150
SIP3-2.54MM [mil]
  rect 60x60 hole 40: 1(0,0)
  round 60 hole 40: 2(0,-100) 3(0,-200)
  silkscreen extent -50,-250 50,50
SIP4-2.54mm [mil]
  rect 60x60 hole 40: 1(0,0)
  round 60 hole 40: 2(0,-100) 3(0,-200) 4(0,-300)
  silkscreen extent -50,-350 50,50
SOD-323 [mm]
  rect 1x0.83 smd: 1(0,0) 2(2.36,0)
  silkscreen extent -1.28,-0.6 1.58,0.6
SOIC-8_208MIL [mil]
  rect 169.29x133.86 smd: 0(0,0)
  rect 24x90 smd: 1(-75,-135)
  oval 24x90 smd: 2(-25,-135) 3(25,-135) 4(75,-135) 5(75,135) 6(25,135) 7(-25,135) 8(-75,135)
  silkscreen extent -100,-216 100,75
SOP8 [mil]
  rect 22x72 smd: 1(0,0)
  oct 22x72 smd: 2(50,0) 3(100,0) 4(150,0) 5(150,220) 6(100,220) 7(50,220) 8(0,220)
  silkscreen extent -25,60 175,160
SOT-23-3 [mm] "SOT-23-3"
  rect 0.6x1 smd: 1(0,0) 2(1.9,0)
  rect 0.7x1 smd: 3(0.95,2.4)
  silkscreen extent -0.93,-0.38 2.45,1.49
SOT-23-6 [mm] "SOT-23-6"
  oct 0.6x1 smd: 1(0,0)
  rect 0.6x1 smd: 2(0.95,0) 3(1.9,0) 5(0.95,2.4) 6(0,2.4)
  rect 0.6x1.04 smd: 4(1.9,2.4)
  silkscreen extent -0.93,-0.38 2.45,1.49
SW1 [mm]
  rect 1.75x1.9 hole 1.4: 0(-4.5,0) 0(4.5,0)
  oval 1.321x1.524 hole 1.016: 1(0,0) 2(-2,0) 3(2,0)
  silkscreen extent -4.51,-2.31 4.5,2.29
TESTPOINT1 [mm]
  round 1.5 smd: 1(0,0)
  silkscreen extent -1,-1 1,1
TESTPOINT2 [mm]
  round 1 smd: 1(0,0)
  silkscreen extent -0.7,-0.7 0.7,0.7
TSOP-54 [mil]
  rect 17x75 smd: 1(0,0) 2(-31.5,0) 3(-62.99,0) 4(-94.49,0) 5(-125.98,0) 6(-157.48,0) 7(-188.98,0) 8(-220.47,0) 9(-251.97,0) 10(-283.46,0) 11(-314.99,0) 12(-346.46,0) 13(-377.95,0) 14(-409.45,0) 15(-440.94,0) 16(-472.44,0) 17(-503.94,0) 18(-535.43,0) 19(-566.93,0) 20(-598.43,0) 21(-629.92,0) 22(-661.42,0) 23(-692.91,0) 24(-724.41,0) 25(-755.91,0) 26(-787.4,0) 27(-818.9,0) 28(-818.9,-460) 29(-787.4,-460) 30(-755.91,-460) 31(-724.41,-460) 32(-692.91,-460) 33(-661.42,-460) 34(-630,-460) 35(-598.43,-460) 36(-566.93,-460) 37(-535.43,-460) 38(-503.94,-460) 39(-472.44,-460) 40(-440.94,-460) 41(-409.45,-460) 42(-377.95,-460) 43(-346.46,-460) 44(-314.99,-460) 45(-283.46,-460) 46(-251.97,-460) 47(-220.47,-460) 48(-188.98,-460) 49(-157.48,-460) 50(-125.98,-460) 51(-94.49,-460) 52(-62.99,-460) 53(-31.5,-460) 54(0,-460)
  silkscreen extent -852,-460 40,0
TSSOP20 [mm]
  rect 0.4x1.2 smd mask+0.05: 1(0,-0.003)
  oval 0.4x1.2 smd mask+0.05: 2(0.65,-0.003) 3(1.3,-0.003) 4(1.951,-0.003) 5(2.601,-0.003) 6(3.251,-0.003) 7(3.899,-0.003) 8(4.549,-0.003) 9(5.199,-0.003) 10(5.85,-0.003) 11(5.85,5.997) 12(5.199,5.997) 13(4.549,5.997) 14(3.899,5.997) 15(3.251,5.997) 16(2.601,5.997) 17(1.951,5.997) 18(1.3,5.997) 19(0.65,5.997) 20(0,5.997)
  silkscreen extent -0.32,1.2 6.14,4.79
TSSOP-10_L3.0-W3.0-P0.50-LS4.9-BL [mm]
  rect 1x0.3 smd mask+0.051: 1(-2.3,1) 2(-2.3,0.5) 3(-2.3,0) 4(-2.3,-0.5) 5(-2.3,-1) 6(2.3,-1) 7(2.3,-0.5) 8(2.3,0) 9(2.3,0.5) 10(2.3,1)
  silkscreen extent -3.37,-1.5 1.5,1.5
TYPE-C-Receptacle-2.0 [mm]
  oval 1x1.6 hole 0.6 slot 1.2 at 90 deg: 0(-4.32,-5.15) 0(4.32,-5.15)
  oval 1x2.1 hole 0.6 slot 1.7 at 90 deg: 0(-4.32,-0.97) 0(4.32,-0.97)
  rect 0.6x1.75 smd mask+0.051: A1(-3.225,0) A4(-2.45,0) B1(3.225,0) B4(2.45,0)
  rect 0.3x1.75 smd mask+0.051: A5(-1.25,0) A6(-0.25,0) A7(0.25,0) A8(1.25,0) B5(1.75,0) B6(0.75,0) B7(-0.75,0) B8(-1.75,0)
  Keep-Out Layer circle w0.1: c2.89,-1.5 r0.325
  Keep-Out Layer circle w0.1: c-2.89,-1.5 r0.325
  silkscreen extent -4.32,-7.75 4.32,-2.55
USB3.0-A-Receptacle [mm]
  round 3.5 hole 2.4: 0(-3.07,-2) 0(10.07,-2)
  round 1.2 hole 0.6: 1(0,0) 2(2.5,0) 3(4.5,0) 4(7,0) 5(7.5,1.5) 6(5.5,1.5) 7(3.5,1.5) 8(1.5,1.5) 9(-0.5,1.5)
  silkscreen extent -3.14,-14.04 10.07,2.85
WFBGA-153-11.5x13x0.8mm [mm]
  round 0.3 smd mask+0.051: A1(0,0) A3(1,0) A4(1.5,0) A5(2,0) A6(2.5,0) A8(3.5,0) A9(4,0) A10(4.5,0) A11(5,0) A12(5.5,0) A13(6,0) A14(6.5,0) B2(0.5,-0.5) B3(1,-0.5) B4(1.5,-0.5) B5(2,-0.5) B6(2.5,-0.5) B8(3.5,-0.5) B9(4,-0.5) B10(4.5,-0.5) B11(5,-0.5) B12(5.5,-0.5) B13(6,-0.5) B14(6.5,-0.5) C2(0.5,-1) C4(1.5,-1) C6(2.5,-1) C8(3.5,-1) C9(4,-1) C10(4.5,-1) C11(5,-1) C12(5.5,-1) C13(6,-1) C14(6.5,-1) D1(0,-1.5) D2(0.5,-1.5) D12(5.5,-1.5) D13(6,-1.5) D14(6.5,-1.5) E1(0,-2) E2(0.5,-2) E3(1,-2) E5(2,-2) E6(2.5,-2) E7(3,-2) E8(3.5,-2) E9(4,-2) E10(4.5,-2) E12(5.5,-2) E13(6,-2) E14(6.5,-2) F1(0,-2.5) F2(0.5,-2.5) F3(1,-2.5) F5(2,-2.5) F10(4.5,-2.5) F12(5.5,-2.5) F13(6,-2.5) F14(6.5,-2.5) G1(0,-3) G2(0.5,-3) G3(1,-3) G5(2,-3) G10(4.5,-3) G12(5.5,-3) G13(6,-3) G14(6.5,-3) H1(0,-3.5) H2(0.5,-3.5) H3(1,-3.5) H5(2,-3.5) H10(4.5,-3.5) H12(5.5,-3.5) H13(6,-3.5) H14(6.5,-3.5) J1(0,-4) J2(0.5,-4) J3(1,-4) J5(2,-4) J10(4.5,-4) J12(5.5,-4) J13(6,-4) J14(6.5,-4) K1(0,-4.5) K2(0.5,-4.5) K3(1,-4.5) K5(2,-4.5) K6(2.5,-4.5) K7(3,-4.5) K8(3.5,-4.5) K9(4,-4.5) K10(4.5,-4.5) K12(5.5,-4.5) K13(6,-4.5) K14(6.5,-4.5) L1(0,-5) L2(0.5,-5) L3(1,-5) L12(5.5,-5) L13(6,-5) L14(6.5,-5) M1(0,-5.5) M2(0.5,-5.5) M3(1,-5.5) M4(1.5,-5.5) M5(2,-5.5) M6(2.5,-5.5) M7(3,-5.5) M8(3.5,-5.5) M9(4,-5.5) M10(4.5,-5.5) M11(5,-5.5) M12(5.5,-5.5) M13(6,-5.5) M14(6.5,-5.5) N2(0.5,-6) N3(1,-6) N4(1.5,-6) N5(2,-6) N6(2.5,-6) N7(3,-6) N8(3.5,-6) N9(4,-6) N10(4.5,-6) N11(5,-6) N12(5.5,-6) N13(6,-6) N14(6.5,-6) P1(0,-6.5) P2(0.5,-6.5) P3(1,-6.5) P4(1.5,-6.5) P5(2,-6.5) P6(2.5,-6.5) P7(3,-6.5) P8(3.5,-6.5) P9(4,-6.5) P10(4.5,-6.5) P11(5,-6.5) P12(5.5,-6.5) P13(6,-6.5) P14(6.5,-6.5)
  silkscreen extent -2.5,-9.75 9,3.25
XT3225 [mm]
  oct 1.3x1.1 smd: 1(0,0)
  rect 1.3x1.1 smd: 2(2.3,0) 3(2.3,1.9) 4(0,1.9)
  silkscreen extent -1.02,-0.8 3.27,2.74
贴片按键 [mm]
  rect 1x2 smd: 1(0,0) 2(4.242,0)
  silkscreen extent 0.69,-1.45 3.55,1.45

## Part data
C1 C2 C3 C4 C5 C6 C7 C8 C9 C10 C11 C12 C13 C14 C15 C16 C22 C23 C24 C25 C26 C27 C28 C29 C31 C32 C33 C35 C36 C37 C38 C39 C40 C41 C42 C43 C44 C45 C46 C47 C56 C57 C58 C59 C60 C61 C62 C63 C64 C65 C67 C69 C70 C71 C72 C73 C74 C75 C76 C77 C78 C79 C80 C81 C82: library part CAP, "Capacitor"
  C41: 容值=100nF
  C42 C43: 容值=33uF
C17 C18 C19 C20 C21 C30 C48 C49 C50 C51 C52 C53 C54 C55: library part Cap, "Capacitor"
  C48 C49 C50 C51 C52 C53 C54 C55: LatestRevisionDate=17-Jul-2002, LatestRevisionNote="Re-released for DXP Platform.", PackageDescription="Radial Cap, Thru-Hole; 2 Leads; 0.3 in Pin Spacing", PackageReference=RAD-0.3, Published=8-Jun-2000, Publisher="Altium Limited"
C66 C68: library part "CAPACITOR POL", "3.3uF"
D1 D2: library part D0603, "Typical RED, GREEN, YELLOW, AMBER GaAs LED", LatestRevisionDate=17-Jul-2002, LatestRevisionNote="Re-released for DXP Platform.", PackageDescription="SM LED; 2 Flat Leads", PackageReference=3.2X1.6X1.1, PackageVersion=Feb-2002, Published=8-Jun-2000, Publisher="Altium Limited"
D3: library part LED0, "Typical INFRARED GaAs LED", LatestRevisionDate=08-Jul-2005, LatestRevisionNote="Mech Layer 1 removed.", PackageDescription="LED; 2 Leads", PackageReference=LED-0, Published=8-Jun-2000, Publisher="Altium Limited"
D4 D5: library part Diode, "Default Diode"
D10: "Default Diode"
IAP1 VBAT1: "测试点"
IAP2: library part Testpoint, "测试点"
J1: library part "Phone Jack"
L1 L2: library part INDUCTOR
LCD1: library part MY-RGB
P1: "Header, 4-Pin"
P2: "Header, 2-Pin"
P3: library part "HEADER 2", "Header, 2-Pin"
P4 P6: "Header, 5-Pin, Dual row"
P5: "Header, 3-Pin"
P8: library part POWER_JACK
P9: library part "Header 2", "Header, 2-Pin", Publisher="Altium Limited"
P10 P11: library part TYPE-C1
P12: library part "HEADER 9x2", "Header, 9-Pin, Dual row"
P14: library part 接线端子, "接线端子 2脚"
P15 P16 P17 P18: library part PAD, "焊盘"
P19: library part "HEADER 3", "Header, 3-Pin"
P20 P21: "Header, 2-Pin, Dual row"
R1 R2 R3 R4 R5 R6 R7 R8 R9 R10 R11 R12 R13 R14 R15 R16 R17 R18 R19 R20 R21 R22 R23 R24 R25 R26 R27 R28 R29 R30 R31 R32 R33 R34 R35 R36 R37 R38 R39 R40 R41 R42 R43 R44 R45 R46 R47 R48 R49 R50 R51 R52 R53 R54 R55 R56 R57 R58 R59 R60 R61 R62 R63 R64 R65 R66 R67 R68 R69 R70 R71 R72 R73 R74 R75 R76 R77 R79 R80 R85 R86 R87 R92 R93 R94 R95 R96 R97 R98 R99 R100 R101 R102 R103 R104 R105 R108 R109 R110 R111 R112 R113 R114 R115 R116 R117 R118 R119 R120 R121 R122 R123 R124 R125 R126 R127 R128: library part RES
R78 R88 R89 R90 R91: library part Res2, "Resistor"
R81 R82 R83 R84: library part R0603, "Resistor", LatestRevisionDate=17-Jul-2002, LatestRevisionNote="Re-released for DXP Platform.", PackageDescription="Axial Device, Thru-Hole; 2 Leads; 0.3 in Pin Spacing", PackageReference=AXIAL-0.3, Published=8-Jun-2000, Publisher="Altium Limited"
R106 R107: library part Res1, "Resistor", LatestRevisionDate=17-Jul-2002, LatestRevisionNote="Re-released for DXP Platform.", PackageDescription="Axial Device, Thru-Hole; 2 Leads; 0.3 in Pin Spacing", PackageReference=AXIAL-0.3, Published=8-Jun-2000, Publisher="Altium Limited"
S1 S2: library part KEY1
S4: "SPDT Subminiature Toggle Switch, Right Angle Mounting, Vertical Actuation"
U1: library part CH32H417QET6, "RISC-V FPU HD-MCU, 384MHz, USB3.0 & PD, 100M Ethernet, DVP, SDMMC, QSPI, OPA, ADC, DAC"
U2: "RISC-V FPU HD-MCU, 144MHz, USB_480M, CAN, UART*2, SPI"
U3: "Step-Down DC-DC Converter, 5V input, FB 0.6V, 800mA output, with LDO 3.3V * 200mA"
U4: "Step-Down DC-DC Converter, 5V input, 1.23V * 700mA output, with LDO 3.3V * 160mA"
U5 U15: library part CH213E, "Ideal Diode 5V*1A"
U6 U7: library part W25Q64
U8 U9: library part MP34DT06JTR
U10: library part KLM8G1GETF-B041
U11: library part ICM-42688-P
U12: library part CS4344-CZZ
U13: library part W9825G6KH-6
U14: library part TJA1050, "High speed CAN transceiver"
Y1 Y2: library part XTAL, "Crystal Oscillator", LatestRevisionDate=17-Jul-2002, LatestRevisionNote="Re-released for DXP Platform.", PackageReference=R38, Published=8-Jun-2000, Publisher="Altium Limited"

## Via types
v1: diameter 17.72, hole 11.81, Top Layer to Bottom Layer, tented both sides, 558 vias
v2: diameter 19.68, hole 11.81, Top Layer to Bottom Layer, tented both sides, 320 vias
v3: diameter 28, hole 16, Top Layer to Bottom Layer, tented both sides, 24 vias
v4: diameter 20, hole 12, Top Layer to Bottom Layer, tented both sides, 22 vias
v5: diameter 27.56, hole 15.75, Top Layer to Bottom Layer, tented both sides, 3 vias

## Nets (pads, with @x,y where several pads share a name; then routed paths per layer and width w, separated by ;. In a path a pad name is that pad's centre, name@x,y a point inside that pad or via, vN(x,y) a via of type N, cw(c..) or ccw(c..) an arc to the next point about the centre after c; other vN are vias at no path point)
1V2: C36.2 C37.2 L2.2 R27.2 R29.2 U4.6 | length 1361.7
  Top Layer w20: L2.2@742.35,917.27 751.37,926.29 860.31,926.29 872.02,914.58 C37.2@872.02,864.9 ; U4.6@761.41,709.97 863.87,709.97 875.58,721.68 C36.2@875.58,804.9 ; C37.2@875.58,864.9 C36.2@875.58,804.9 ; v2(903.01,804.77) 902.89,804.9 C36.2@875.58,804.9 ; v1(2865.25,1063.24) v1@2872.94,1063.24 ; R27.2@2886.96,1113.02 2886.96,1077.27 ; v1@2889.56,1062.94 2889.26,1063.24 v1@2872.94,1063.24 ; v1(2889.84,1063.24) 2886.96,1066.13 2886.96,1077.27 ; R29.2@3244.94,1475.16 v1@3263.2,1475.16 ; v1(3263.6,1474.75) v1@3263.2,1475.16 ; v1@3284.51,1483.31 3276.35,1475.16 v1@3263.2,1475.16 ; v1@2872.94,1063.24 2886.96,1077.27
  Layer 2 w20: v2(903.01,804.77) 903.23,804.77 992.85,715.16 1416.24,715.16 ; v1@2887.45,1058.76 2887.8,1059.1 2919.85,1059.1 2919.85,896.74
  other v1: 3283.5,1483.6
  other v2: 878.56,778.29 903.52,779.41 903.52,829.33
3V3: C30.1 C46.2 C47.2 C48.2 C49.1 C50.1 C58.2 C59.2 C60.2 C61.2 C62.2 C70.2 C71.2 C72.2 C73.2 C74.2 C75.2 C76.2 C81.2 C82.2 D1.1 D2.1 D3.1 LCD1.6 LCD1.7 P4.8 P5.2 P12.1 R15.2 R17.1 R20.2 R22.1 R31.2 R35.2 R37.2 R39.2 R82.2 R92.1 R93.2 R94.1 R95.2 R96.2 R106.2 R110.1 R111.1 U2.14 U6.8 U7.8 U8.1 U9.1 U10.E6 U10.F5 U10.J10 U10.K9 U11.5 U11.8 U12.9 U13.1 U13.3 U13.9 U13.14 U13.27 U13.43 U13.49 | length 17639.1
  Top Layer w8: U10.F5@1174.52,1113.96 1189.48,1113.96 ; 1194.09,1119.16 1194.09,1118.56 1189.48,1113.96 ; U10.E6@1194.2,1133.64 1194.2,1113.96 ; v1@1252.17,1055.99 1194.2,1113.96 ; U10.K9@1253.26,1035.22 1252.71,1035.76 1252.71,1054.98 1252.48,1055.21 1272.63,1055.21 U10.J10@1272.94,1054.9 1273.16,1054.68 1282.62,1054.68 1290.54,1046.76 v1(1292.17,1046.76) ; U9.1@2601.73,2570 2601.73,2559.17 2611.43,2549.47 2616.42,2549.47 2617.69,2548.2 2646.86,2548.2 ; U8.1@2601.73,2788.43 2601.73,2777.6 2605.61,2773.72 2608.49,2773.72 2622.2,2760.01 2687.4,2760.01 C82.2@2694.25,2766.87 ; C47.2@2693.71,2595.05 2692.09,2595.05 2687.4,2590.36 2687.4,2588.74 2646.86,2548.2 ; C47.2@2698.19,2589.69 2656.7,2548.2 2646.86,2548.2 ; C58.2@4063.65,1403.22 4063.87,1403.44 4063.87,1453.47 U11.5@4064.08,1453.69 ; U11.8@4132.99,1463.53 4159.69,1463.53 ; C59.2@4175.06,1458.14 4165.08,1458.14 4159.69,1463.53 ; C59.2@4177.37,1463.53 4159.69,1463.53 ; 1189.48,1113.96 1194.2,1113.96
  Top Layer w12: 3423.09,2431.77 3459.81,2468.49 ; 3434.71,2431.77 3459.81,2456.88 ; 3445.96,2431.77 3459.81,2445.63 3459.81,2451.68 3459.81,2456.88 ; U12.9@3459.81,2504.22 3459.81,2468.49 ; 4566.12,1387.81 4619.14,1387.81 ; 4570.42,1397.57 4580.35,1407.5 4604.12,1407.5 ; 4592.63,1396 4604.12,1407.5 ; LCD1.6@4685,1387.81 4619.14,1387.81 ; LCD1.7@4685,1407.5 4622.45,1407.5 ; 3459.81,2456.88 3459.81,2468.49 ; 4604.12,1407.5 4610.95,1407.5 ; 4610.95,1396 4622.45,1407.5 ; 4610.95,1396 4610.95,1407.5 ; 4610.95,1396 4619.14,1387.81 ; 4610.95,1407.5 4622.45,1407.5
  Top Layer w15: C76.2@847.21,2157.95 C76.2@847.4,2157.77 848.88,2159.25 946.4,2159.25 U13.9@947.4,2160.25 ; v1@847.21,2253.84 v1(847.02,2254.02) v1@847.21,2254.21 ; C73.2@847.21,2344.58 C73.2@847.4,2344.77 ; C75.2@847.4,2017.77 847.4,2016.78 861.41,2002.77 U13.14@947.4,2002.77 ; C73.2@847.4,2343.75 852.87,2349.22 U13.3@947.4,2349.22 ; C70.2@847.4,2411.21 C70.2@847.4,2409.77 848.84,2411.21 946.4,2411.21 U13.1@947.4,2412.21 ; v1@847.91,1550.08 847.65,1550.34 847.65,1591.51 C74.2@847.4,1591.77 848.95,1593.32 U13.27@947.4,1593.32 ; C30.1@1232.24,2766.1 1234.66,2763.67 1247.76,2763.67 ; 1232.24,2779.19 1247.76,2763.67 ; U2.14@1300.92,2763.67 1247.76,2763.67 ; U13.43@1407.4,2065.76 1408.4,2064.76 1500.4,2064.76 C71.2@1502.4,2062.77 ; U13.49@1407.4,2254.73 1407.91,2255.25 1501.88,2255.25 C72.2@1502.4,2255.77 ; R96.2@2695,2835 2695,2765.44 2778.45,2765.44 2784.54,2759.34 2784.54,2612.01 ; C47.2@2696.2,2598.17 C46.2@2750.74,2598.17 ; C59.2@4185.18,1455.58 C59.2@4185.18,1463.58 4185.18,1488.23 4193.97,1497.02 4209.86,1497.02 4218.65,1505.81 R111.1@4218.65,1533.22 ; C46.2@2750.74,2598.17 2755.05,2593.86 2760.6,2593.86 v1(2773.71,2580.76) v1@2773.71,2581.49 ; C46.2@2750.74,2598.17 2770.71,2598.17 v1@2773.71,2601.17 ; v1@2773.71,2581.49 v1@2773.71,2601.17 ; v1@2773.71,2581.49 2784.54,2592.33 2784.54,2612.01 ; v1@2773.71,2601.17 2784.54,2612.01
  Top Layer w20: D3.1@494.76,1804.93 494.76,1847.12 506.47,1858.84 710.06,1858.84 726.2,1842.7 726.2,1745.46 737.92,1733.74 v5(842.04,1733.74) ; C76.2@847.21,2157.95 v1@847.21,2253.84 ; v1@847.21,2254.21 C73.2@847.21,2344.58 ; C75.2@847.4,2017.77 C76.2@847.4,2157.77 ; C73.2@847.4,2344.77 C70.2@847.4,2409.77 ; v1@862.25,1014.23 884.2,1014.23 R106.2@912.31,1014.23 ; v1(1232.02,2792.51) v1@1232.24,2792.29 ; v1(1232.02,2814.05) 1232.24,2813.83 v1@1232.24,2792.29 ; C30.1@1232.24,2766.1 1232.24,2779.19 v1@1232.24,2792.29 ; C50.1@1239.55,1396.29 C49.1@1295.22,1396.29 C48.2@1350.89,1396.29 v1@1375.26,1396.29 ; v1(1375.57,1395.98) v1@1375.26,1396.29 ; v1(1397.57,1395.98) 1397.26,1396.29 v1@1375.26,1396.29 ; C71.2@1502.4,2062.77 v1(1502.4,2215.69) C72.2@1502.4,2255.77 v1(1502.4,2284.28) ; R82.2@1635.8,2855.06 v1(1635.8,2925.43) v1@1635.8,2948.06 ; v5(1906.72,2631.55) D2.1@1906.72,2672.23 D1.1@1906.72,2742.31 ; v1@2233.54,1347.91 2225.45,1347.91 v1(2216.04,1338.5) 2223.94,1330.6 2237.29,1330.6 2239.1,1328.79 R35.2@2239.1,1327.8 ; v1(2235.52,1350.22) 2240.39,1345.35 R35.2@2240.39,1334.21 ; v1(2284.3,1962.54) 2289.15,1962.54 2300.87,1974.26 v1(2300.87,1977.32) 2312.77,1989.22 2312.77,1991.41 2320.05,1998.69 2320.05,1999.67 R31.2@2321.86,2001.48 ; v1(2885.22,2000.94) v1(2907.79,2000.94) 2913.76,1994.97 R39.2@2929.62,1994.97 R37.2@2975.66,1994.97 ; v1(3362.34,2575.49) v1(3362.34,2552.05) 3362.34,2443.49 3374.05,2431.77 3423.09,2431.77 3434.71,2431.77 3445.96,2431.77 3479.72,2431.77 ; 3459.81,2451.68 3479.72,2431.77 ; R94.1@3746.53,1823 3746.53,1783.72 3758.25,1772 3768.87,1772 ; R92.1@3746.53,2119.88 3746.53,2079.72 3758.25,2068 U6.8@3871,2068 3871,2007.89 3891.7,1987.18 4237.17,1987.18 ; U7.8@3871,1772 3799.35,1772 ; C59.2@4185.18,1455.58 C60.2@4185.18,1413.58 4185.18,1371.06 4161.83,1347.71 4075.36,1347.71 4063.65,1359.43 4063.65,1388.86 ; R111.1@4218.65,1533.22 4261.81,1533.22 4411.55,1383.48 4561.79,1383.48 ; R15.2@4536.54,2042.01 R17.1@4536.54,2079.09 ; R17.1@4536.54,2086.45 4281.62,2086.45 ; 4598.97,1387.63 4594.82,1383.48 4561.79,1383.48 ; 4610.95,1396 4592.63,1396 4574.31,1396 4566.12,1387.81 4561.79,1383.48 ; 3479.72,2431.77 3548.98,2362.51 C61.2@3589.22,2362.51 C62.2@3636.76,2362.51 4212.5,2362.51 4258.46,2316.55 R93.2@4258.46,2171 4258.46,2109.08 ; 3768.87,1772 3799.35,1772 ; 3768.87,1772 3787.64,1753.23 ; 3787.64,1753.23 3787.64,1760.28 3799.35,1772 ; 3787.64,1753.23 3787.64,1715.95 3804.9,1698.69 3920.56,1698.69 3935.5,1683.75 3935.5,1654.48 ; 3935.5,1625.22 3935.5,1654.48 ; 3935.5,1625.22 R110.1@3935.5,1521.06 3935.5,1431.05 3963.33,1403.22 4049.29,1403.22 ; 3935.5,1625.22 3947.22,1636.93 3953.05,1636.93 ; 3935.5,1654.48 3953.05,1636.93 ; 3953.05,1636.93 R22.1@4080.25,1636.93 4114.18,1636.93 4288.18,1810.93 4288.18,1858.28 4276.46,1870 R95.2@4258.46,1870 4258.46,1966.63 ; 4049.29,1403.22 4063.65,1388.86 ; 4049.29,1403.22 C58.2@4063.65,1403.22 4063.65,1388.86 ; 4237.17,1987.18 4237.91,1987.18 ; 4237.17,1987.18 4258.46,2008.48 ; 4237.91,1987.18 4258.46,1987.18 ; 4237.91,1987.18 4258.46,1966.63 ; 4258.46,1966.63 4258.46,1987.18 ; 4258.46,1987.18 4258.46,2008.48 ; 4258.46,2008.48 4258.46,2063.29 ; 4258.46,2063.29 4258.46,2086.45 ; 4258.46,2063.29 4281.62,2086.45 ; 4258.46,2086.45 4258.46,2109.08 ; 4258.46,2086.45 4281.1,2086.45 ; 4258.46,2109.08 4281.1,2086.45 ; 4281.1,2086.45 4281.62,2086.45
  Layer 2 w15: v1(847.02,2254.02) 847.76,2254.02 849.42,2252.36 1301.86,2252.36 1333.79,2284.28 v1(1502.4,2284.28) 1605.01,2386.9 1900.03,2386.9 2235.86,2386.9
  Layer 2 w20: v1(1232.02,2792.51) 1633.56,2792.51 ; 1635.8,2959.27 v1(1635.8,2949.27) v1(1635.8,2925.43) 1635.8,2650.47 1647.51,2638.75 ; 1900.03,2386.9 1906.72,2393.58 ; v1(2216.04,1338.5) 2216.04,1321.66 2175.96,1281.58 2006.38,1281.58 1965.38,1322.57 1965.38,1841.08 1977.1,1852.8 2183.58,1852.8 2235.86,1905.09 2235.86,1960.29 ; 2235.86,2379.38 2235.86,1960.29 ; v1@2283.84,1960.29 2235.86,1960.29 ; 2430.01,2573.53 2430.01,3045.96 2528.15,3144.09 ; 2733.04,2565.01 2743.52,2575.49 2949.93,2575.49 ; 2949.61,2575.81 2949.93,2575.49 ; v1(3362.34,2575.49) 2949.93,2575.49
  Layer 2 w30: v5@842.44,1734.13 842.44,2249.44 v1(847.02,2254.02) ; v5@842.76,1733.74 842.76,1555.24 847.91,1550.08 1223.15,1550.08 1375.57,1397.67 v1(1375.57,1395.98) 1380.44,1391.11 1380.44,1135.04 v1(1292.17,1046.76) 1260.92,1046.76 v1(1252.17,1055.52)
  Bottom Layer w20: v1@883.35,1015.08 v1(884.18,1014.26) ; v2@960.6,854.41 960.6,721.26 821.41,582.06 821.41,229.63 833.12,217.92 1018.71,217.92 1030.43,206.2 P5.2@1030.43,102.71 P5.2@1030.43,99.08 ; 2282.95,1940.87 2302.38,1960.29 ; v1@2283.84,1960.29 2302.38,1960.29 ; v1(2907.79,2000.94) v1(2885.22,2000.94) 2797.51,2000.94 2715.19,2083.25 2374.79,2083.25 2349.41,2057.88 2349.41,1972.01 2337.7,1960.29 2302.38,1960.29
  other v1: 862.22,1014.26 860.74,1037 882.7,1037 876.41,1545.99 847.91,1548.08 875.83,1566.51 847.33,1568.6 847.02,2232.48 2773.71,2602.17
  other v2: 950.6,832.15 976.53,832.21 951.6,857.47 977.53,857.47
5V: C31.2 C32.2 C38.2 C39.2 LCD1.1 LCD1.2 P4.10 U3.4 U4.4 U14.3 U15.2 | length 4866.9
  Top Layer w12: v1@4542.4,1208.72 4532.6,1218.52 4532.6,1286.87 4545.81,1300.08 4615.72,1300.08 ; 4605.02,1289.39 4615.72,1300.08 ; 4617.79,1289.39 4617.9,1289.39 4630.55,1302.04 ; 4630.55,1289.39 4630.55,1302.04 ; 4642.12,1291.15 4642.12,1299.47 LCD1.2@4646.42,1303.77 ; LCD1.1@4646.71,1290.23 4646.71,1303.48 LCD1.2@4646.42,1303.77 ; LCD1.2@4685,1309.07 LCD1.2@4651.72,1309.07 ; 4615.72,1300.08 4624.71,1309.07 4637.58,1309.07 ; 4630.55,1302.04 4637.58,1309.07 ; 4637.58,1309.07 LCD1.2@4651.72,1309.07 ; LCD1.2@4646.42,1303.77 LCD1.2@4651.72,1309.07
  Top Layer w20: v2(495.21,981.16) 495.21,726.54 506.93,714.83 C38.2@566.61,714.83 566.61,665.4 ; C38.2@566.61,716.83 612.09,716.83 614.82,719.55 624.61,719.55 C39.2@626.61,721.55 ; C39.2@626.61,721.36 627.59,721.36 638.98,709.97 U4.4@686.61,709.97 ; C32.2@942.75,578.76 C32.2@946.12,582.13 ; U3.4@946.12,451.16 946.12,482.72 ; C32.2@946.12,583.83 C32.2@946.12,582.13 ; 948.38,484.97 946.12,482.72 ; C32.2@951.05,588.05 951.05,587.07 C32.2@946.12,582.13 ; U14.3@2146,703 2146,630.75 2130.42,615.17 2060.19,615.17 2047.36,602.34 2047.36,445.66 2047.36,444.75 ; v1@4544.51,1211.41 v1(4544.51,1212.41) v1(4544.51,1232.78) 4544.51,1277.67 4556.23,1289.39 4568.59,1289.39 ; 4545.78,1266.58 4568.59,1289.39 ; v1@4549.17,1210.55 4553.3,1214.68 4553.3,1253.14 4553.3,1260.73 4569.83,1277.26 4657.25,1277.26 LCD1.1@4669.38,1289.39 ; 4617.79,1289.39 4605.02,1289.39 4568.59,1289.39 ; 4617.9,1289.39 4630.55,1289.39 LCD1.1@4669.38,1289.39 ; LCD1.1@4685,1289.39 LCD1.1@4669.38,1289.39 ; 946.12,482.72 C32.2@946.12,582.13 ; 2047.36,444.75 v1(2025.33,422.71) v1(2047.36,422.71) 2047.36,444.75
  Layer 2 w20: 1236.03,185.64 1983.14,185.64 2071.76,274.26 ; P4.10@1377.3,3140.86 P4.10@1385.63,3140.86 ; 3241.01,117.2 4413.95,117.2 ; 4544.51,247.76 v1(4544.51,1212.41) v1@4544.51,1231.2
  other v1: 900.37,456.65 877.82,479.52 900.37,479.52 922.93,479.52 4544.58,1253.14 660.66,1988.73 636.35,2000.87 660.66,2015.89 636.35,2029.58 660.66,2043.05
  other v2: 518,948.47 495.47,959 518,970.99
5V_IN: P9.1 U5.3 | length 325.3
  Top Layer w30: P9.1@453.73,109.29 450.98,112.04 450.98,196.65 468.55,214.22 U5.3@680.54,214.22
AOUTL: C66.1 R121.1 U12.7 | length 603.9
  Top Layer w6: U12.7@3497.45,2515.12 3497.45,2542.21 3535.06,2579.83 3754.71,2579.83 3847.85,2486.69 C66.1@4020.11,2486.69
AOUTR: C68.1 R124.1 U12.10 | length 481.9
  Top Layer w6: U12.10@3440.13,2504.22 3440.13,2587.01 3499.54,2646.43 C68.1@3814.65,2646.43
CAN1_RX: R77.1 U14.4 | length 799
  Top Layer w8: U14.4@2096,703 2096,786.88 2121.21,812.09 2550.35,812.09 2662.33,924.08 R77.1@2662.33,1016.02
CAN1_TX: R80.1 U14.1 | length 675.7
  Top Layer w8: U14.1@2246,703 2246,765.92 2273.37,793.29 2560.97,793.29 2714.9,947.22 R80.1@2714.9,1016.02
CANH: P14.2 R128.1 U14.7 | length 496.3
  Top Layer w8: U14.7@2196,483 2196,413.48 2195.81,413.29 2195.81,408.8 2188,400.98 R128.1@2188,400 2188,378.9 2176.79,367.7 2176.79,317.8 2200,294.6 2289.98,294.6 2318.99,265.58 2318.99,235.01 P14.2@2410,144
CANL: P14.1 R128.2 U14.6 | length 493.7
  Top Layer w8: U14.6@2146,483 2149.27,479.73 R128.2@2149.27,403.27 ; R128.2@2151.27,403.27 R128.2@2154.54,400 2154.54,375.92 2163.72,366.74 2163.72,322.8 2163.79,322.73 2163.79,312.42 2196.55,279.66 2283.79,279.66 2304.05,259.39 2304.05,238.05 P14.1@2210,144
CC1: P10.A5 R51.1 R90.1 | length 1645.3
  Top Layer w8: v1(1492.5,417.86) 1493.43,416.93 1521.07,416.93 R90.1@1522,416 1522.98,416 1530.8,408.19 1530.8,407.2 1540.87,397.13 P10.A5@1540.87,306.76 ; v1(1865.62,853) 1904.51,891.9 2524.65,891.9 2557.2,924.45 R51.1@2557.2,1016.02
  Bottom Layer w8: v1(1492.5,417.86) 1630.25,417.86 1678.26,465.86 1678.26,689.95 1841.32,853 v1(1865.62,853)